# Altium PCB BYTE_SPIne.PcbDoc (part 1 of 3)
Units mm, origin at the board's own origin, x right, y up, seen from the top; angles counter-clockwise.
Board outline 108 x 73 mm, 4 copper layers (Top Layer, GND, PWR, Bottom Layer), stack 1.586 mm thick; 173 components, 126 nets, 724 pads, 308 vias.
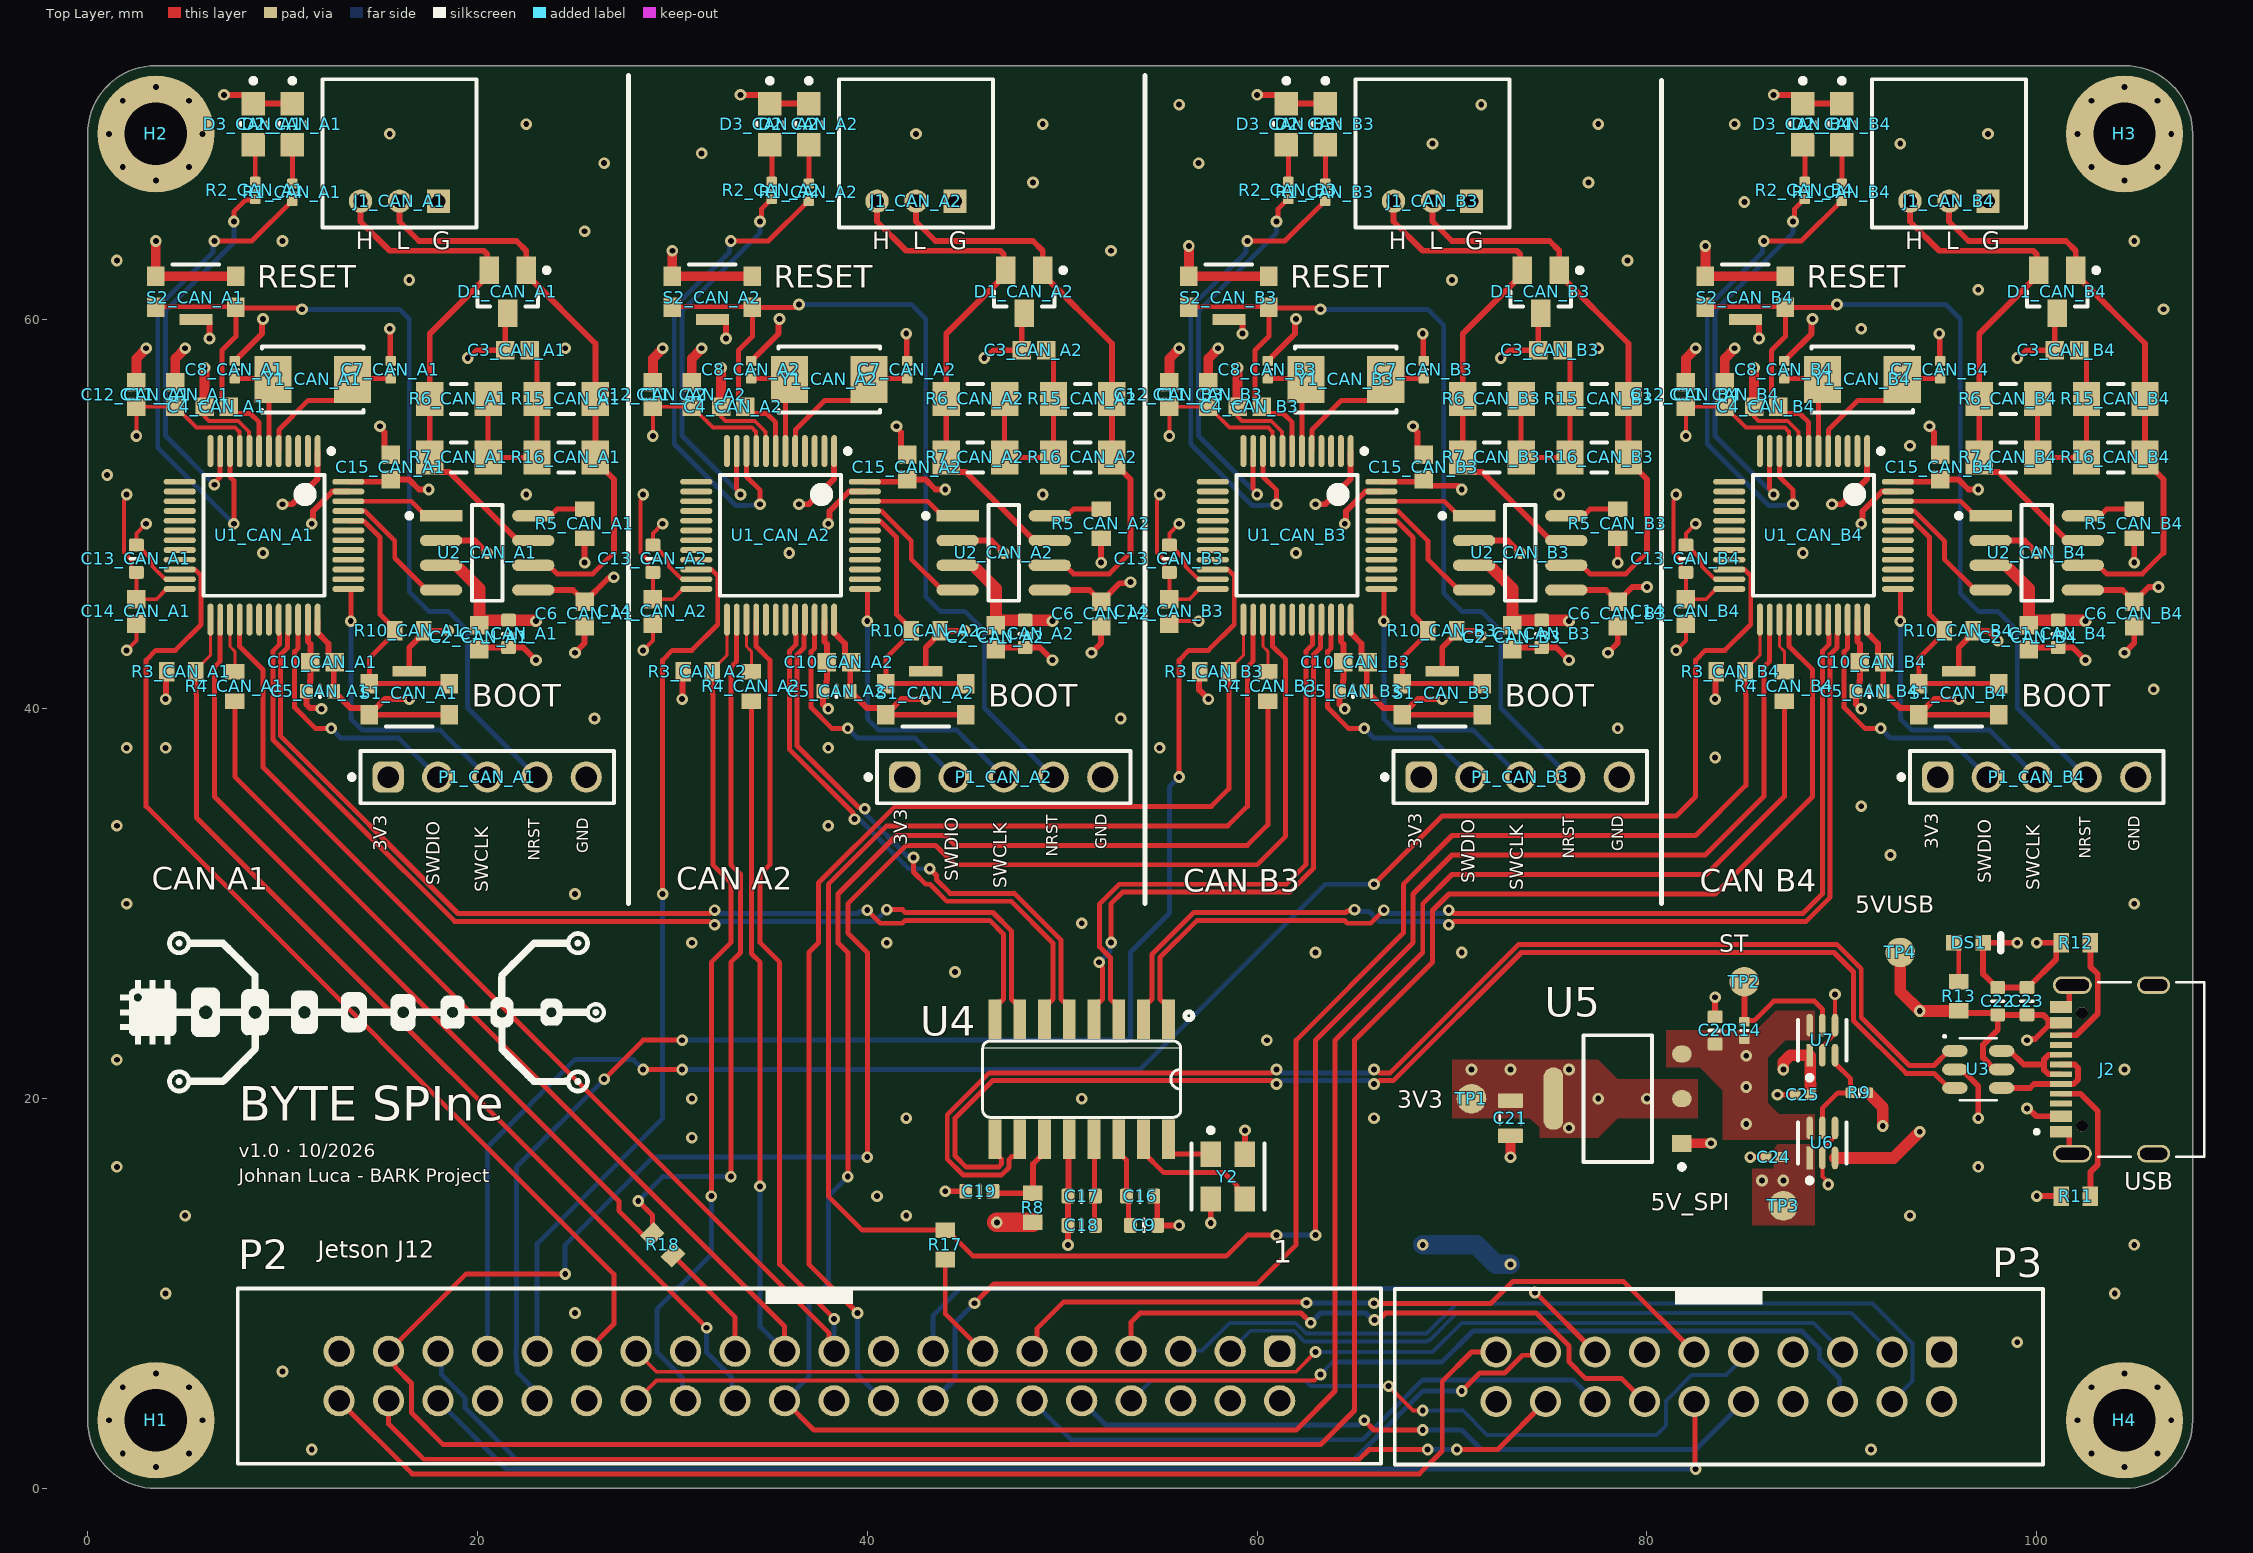
[diagram p0: Top Layer view]
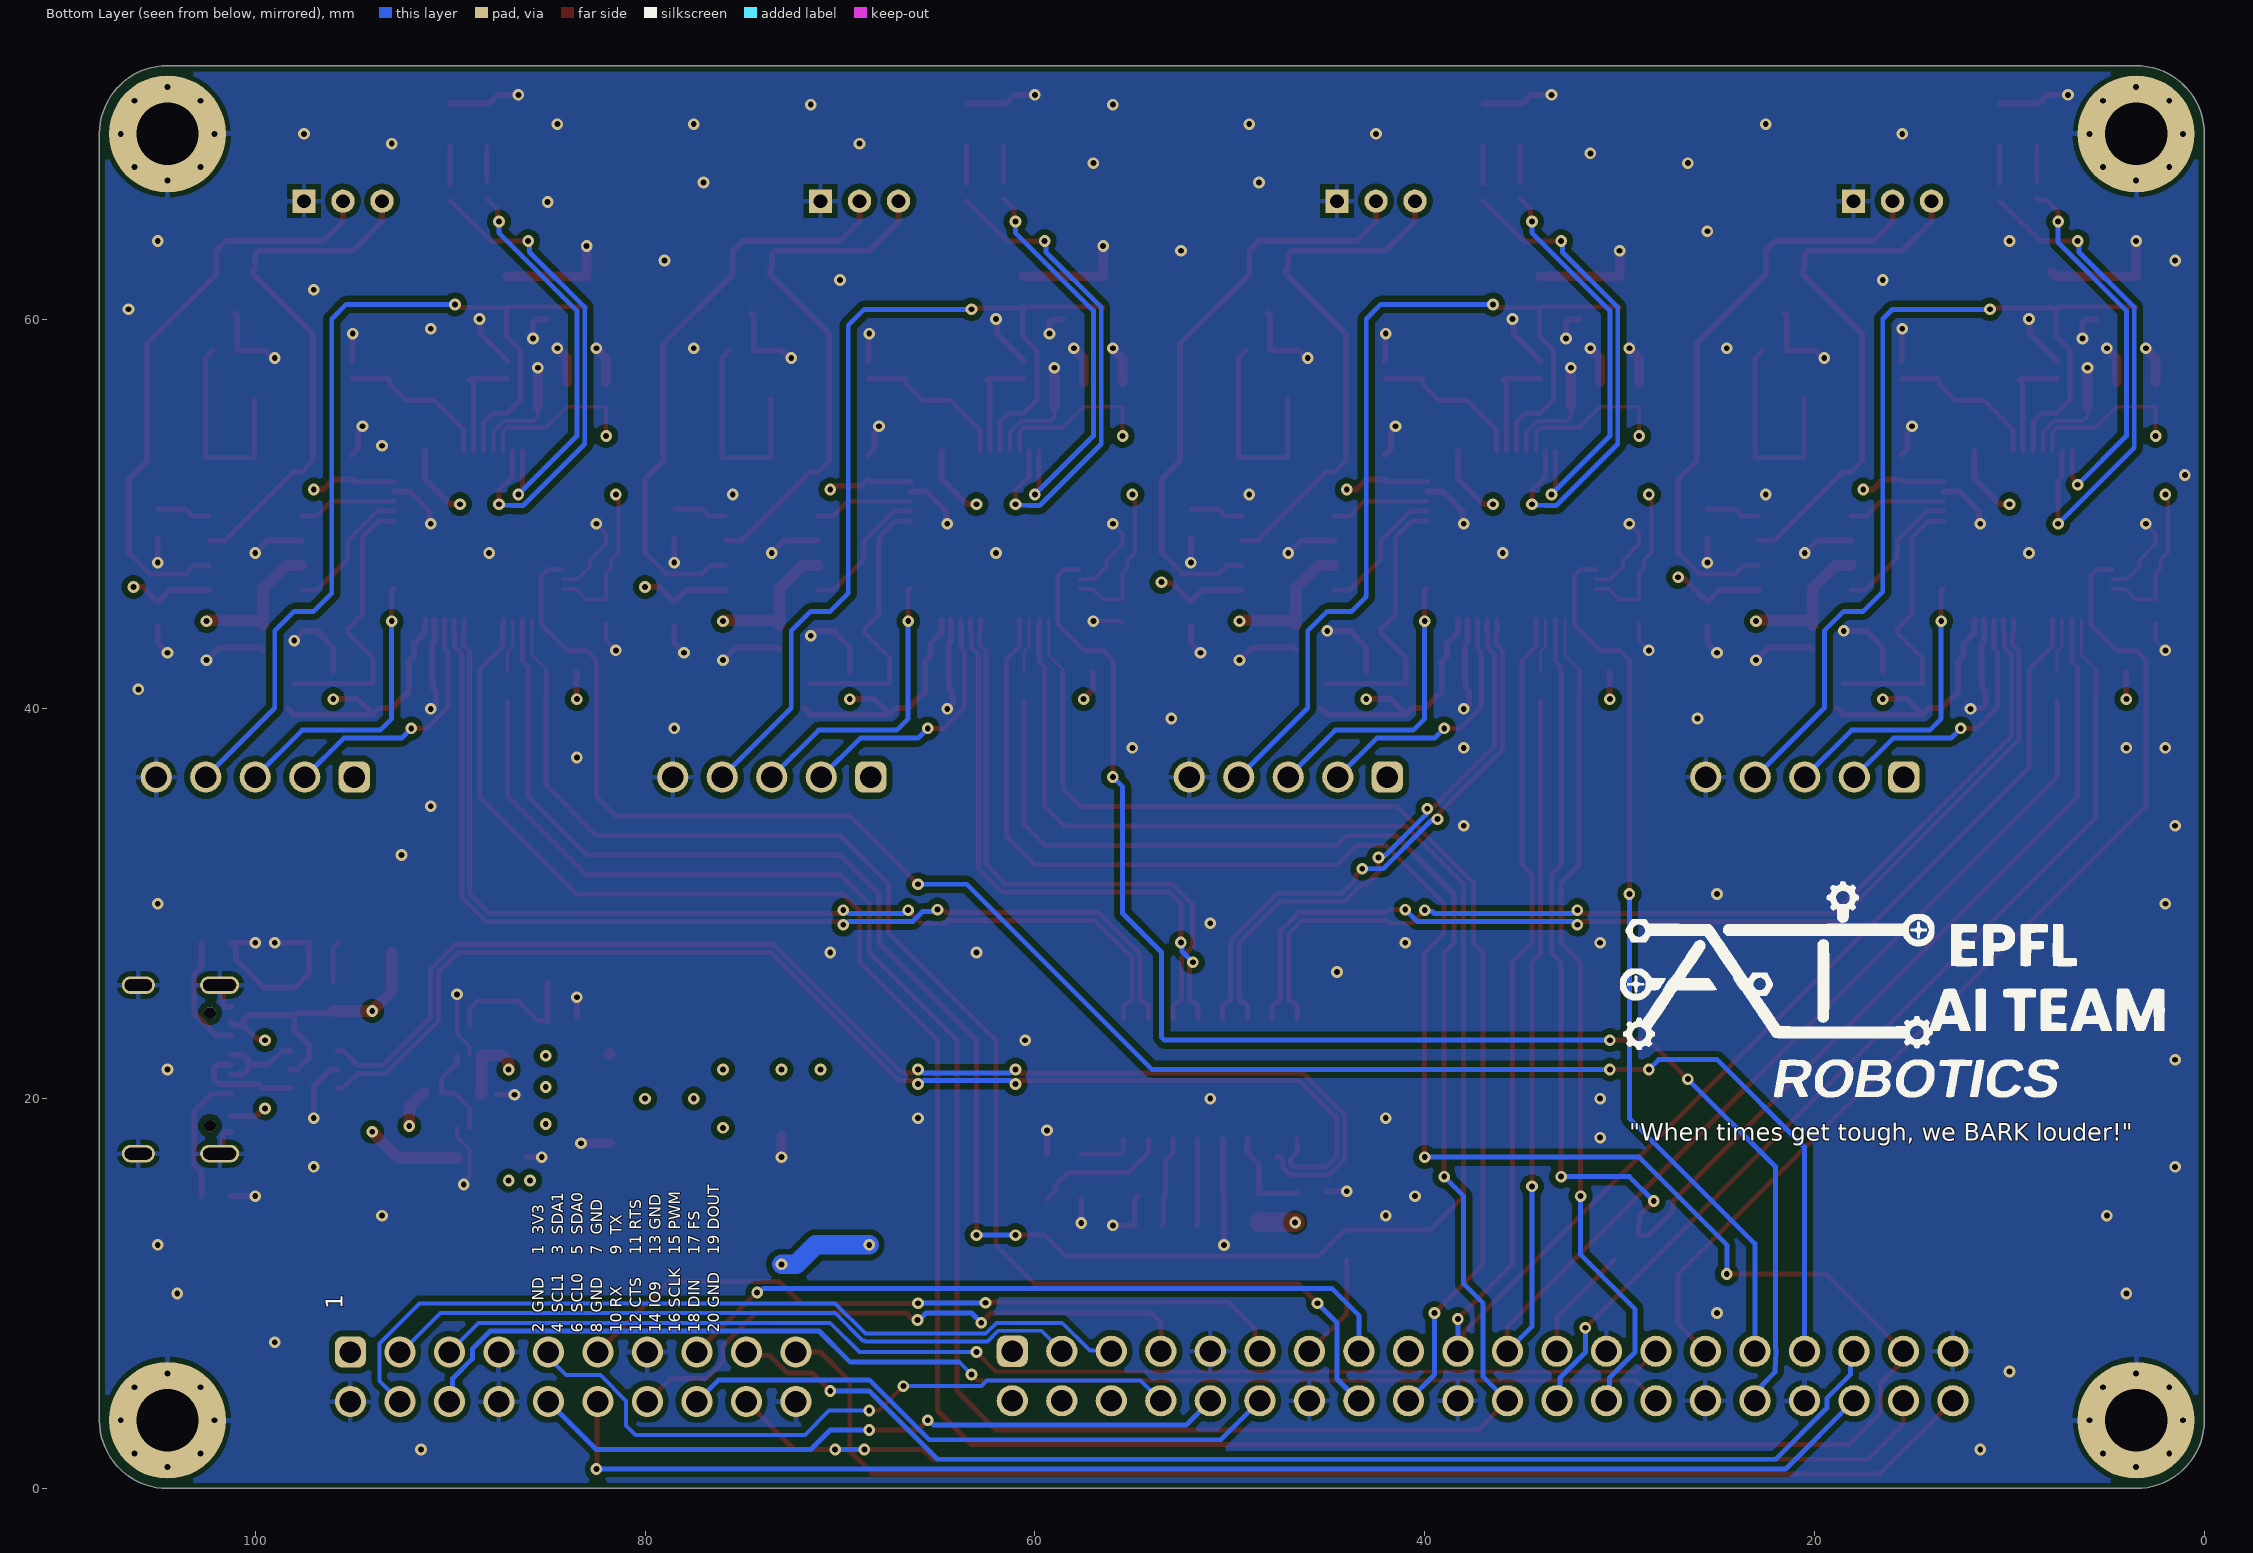
[diagram p1: Bottom Layer view, seen from below]
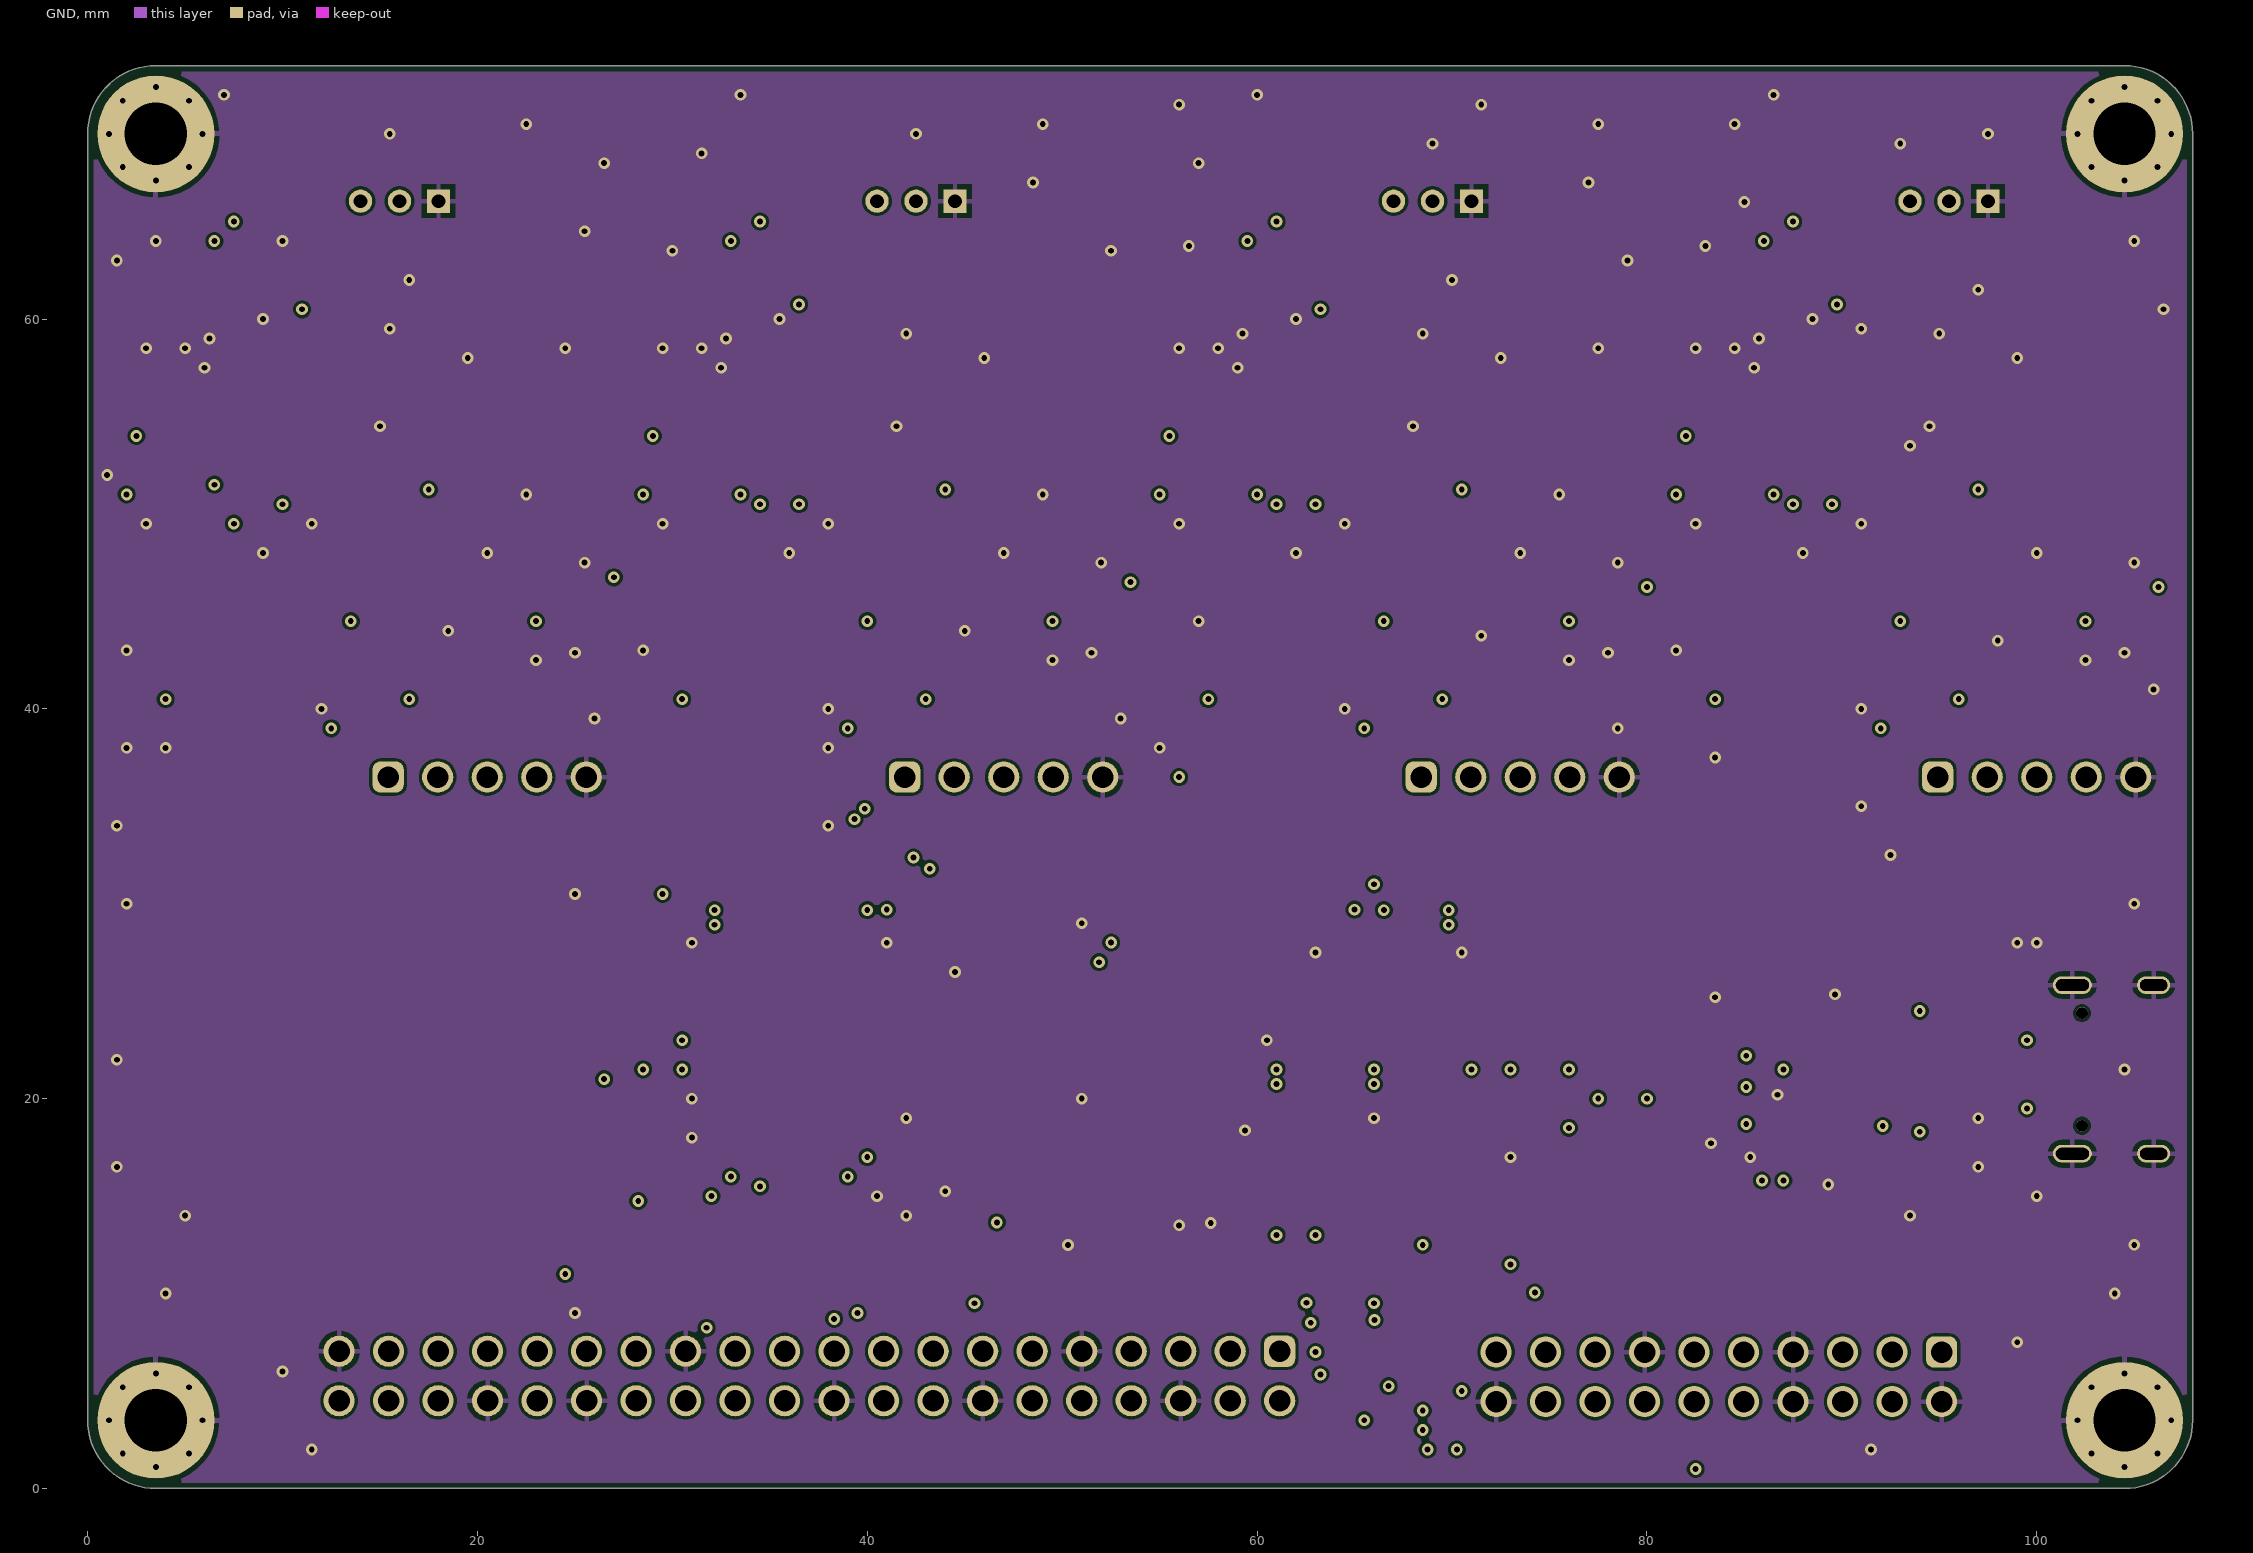
[diagram p2: GND]
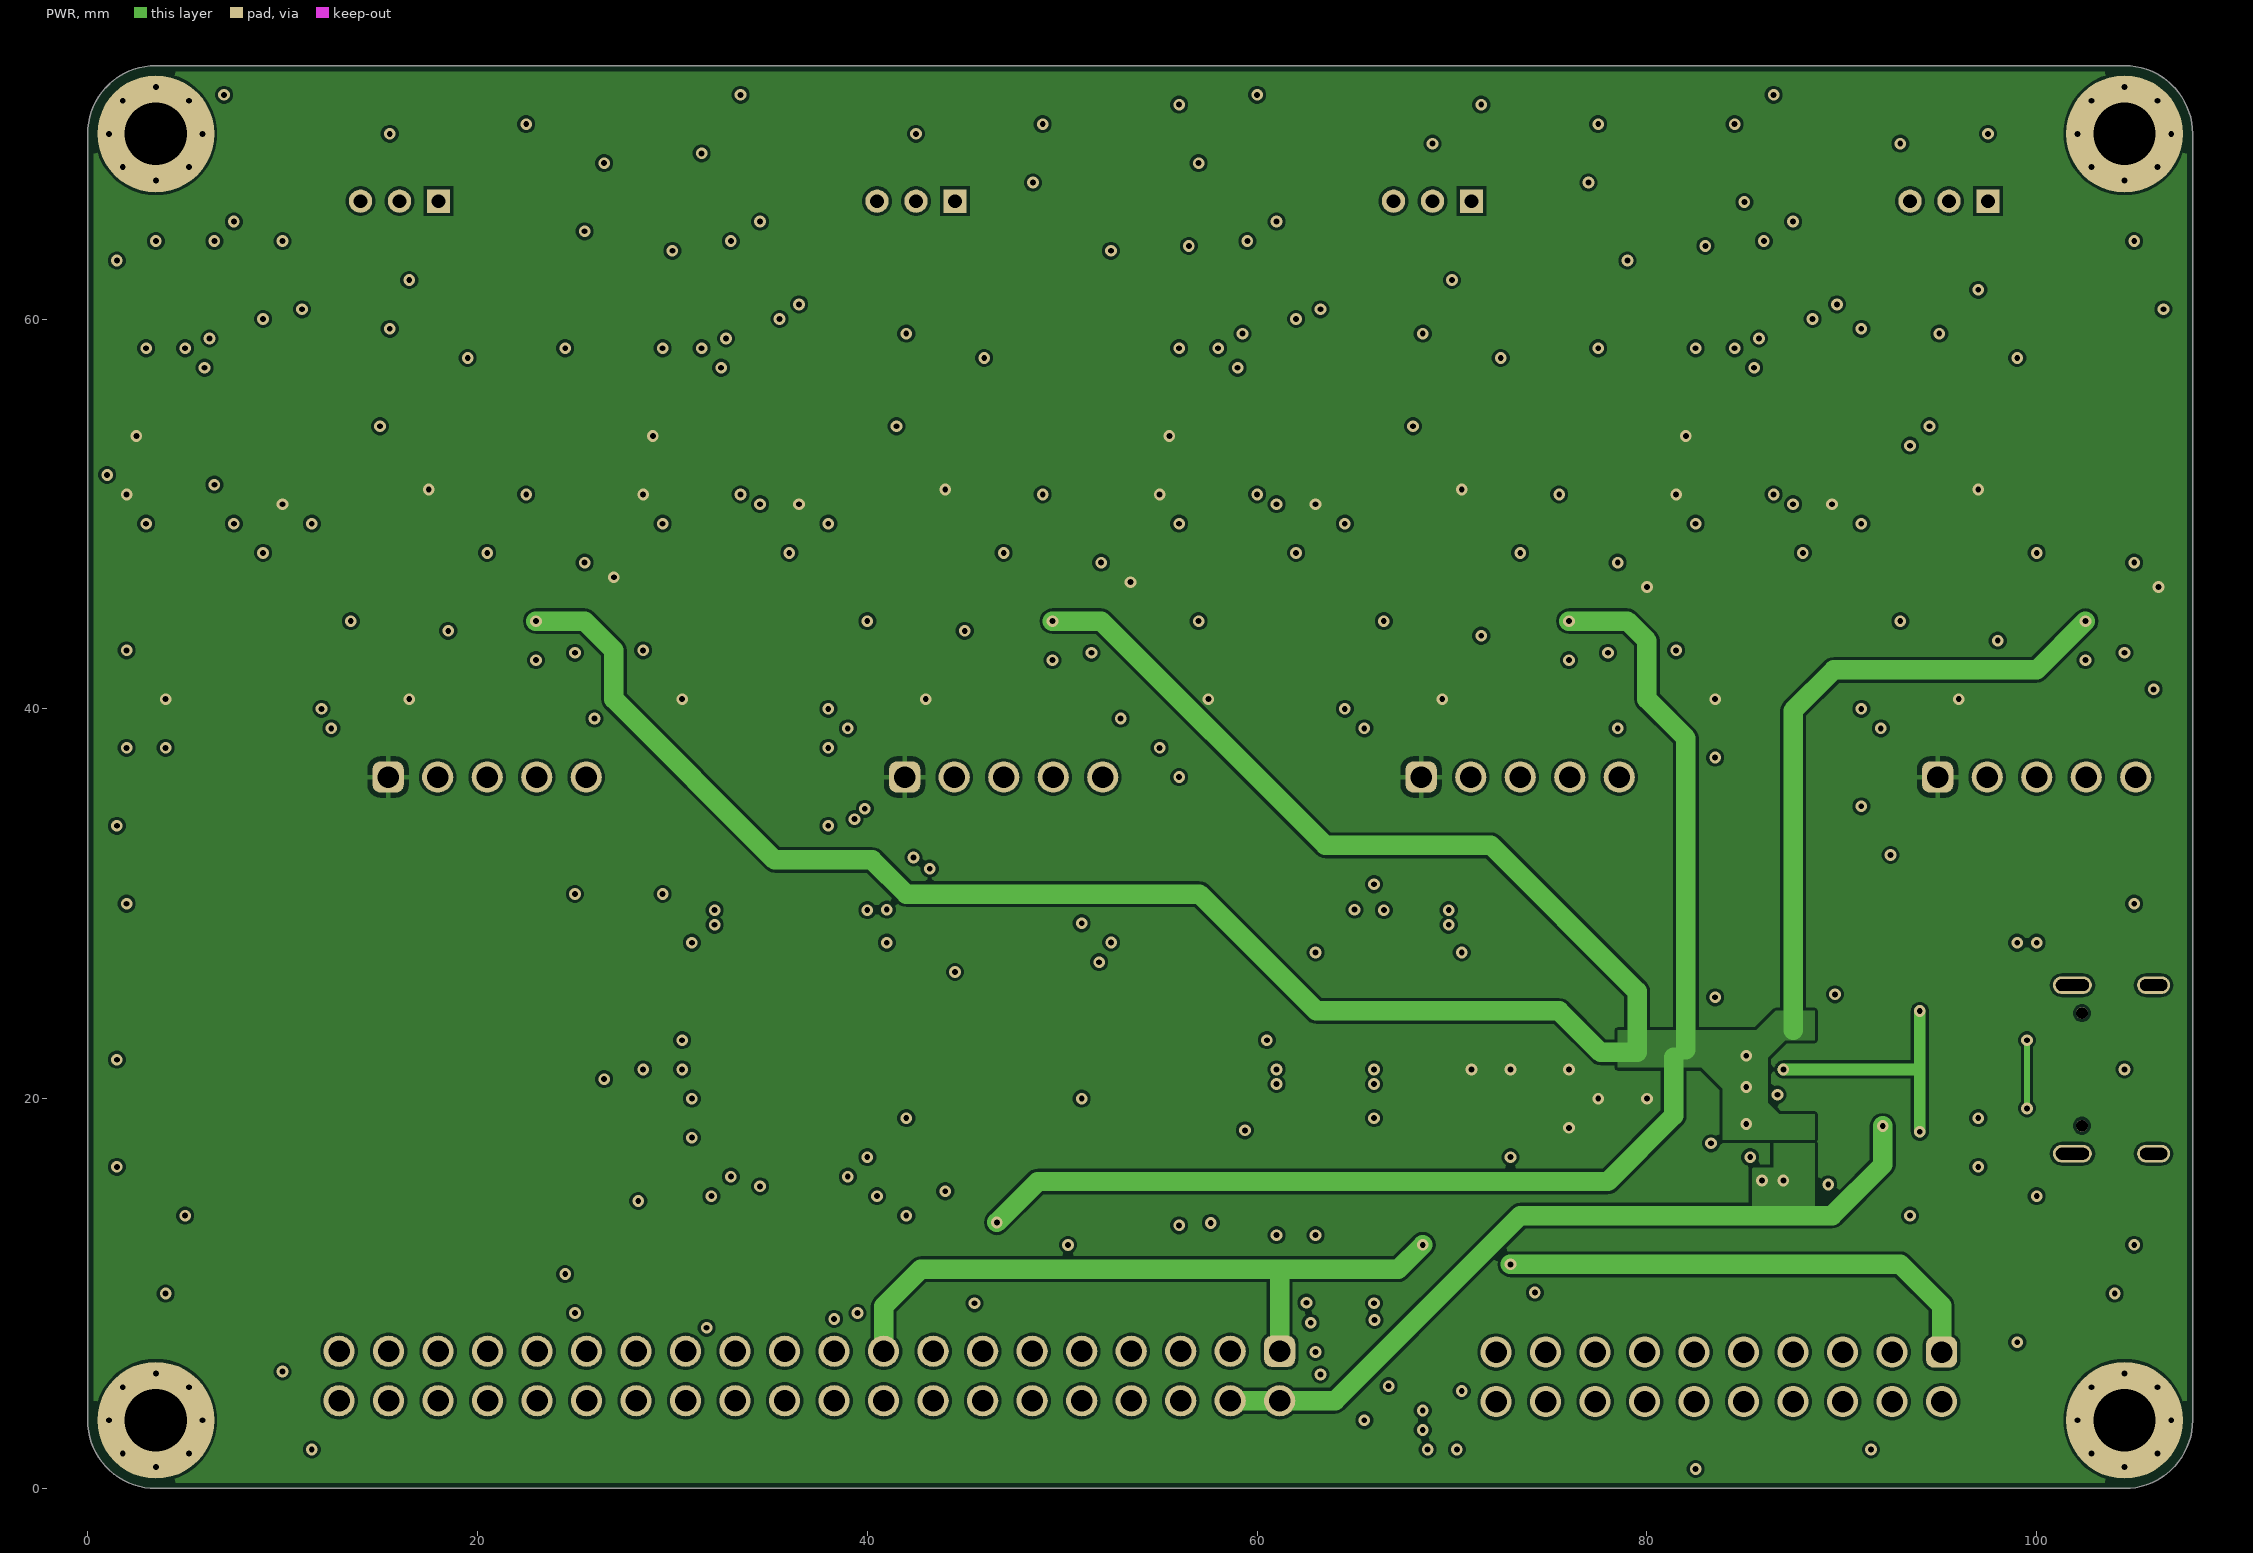
[diagram p3: PWR]
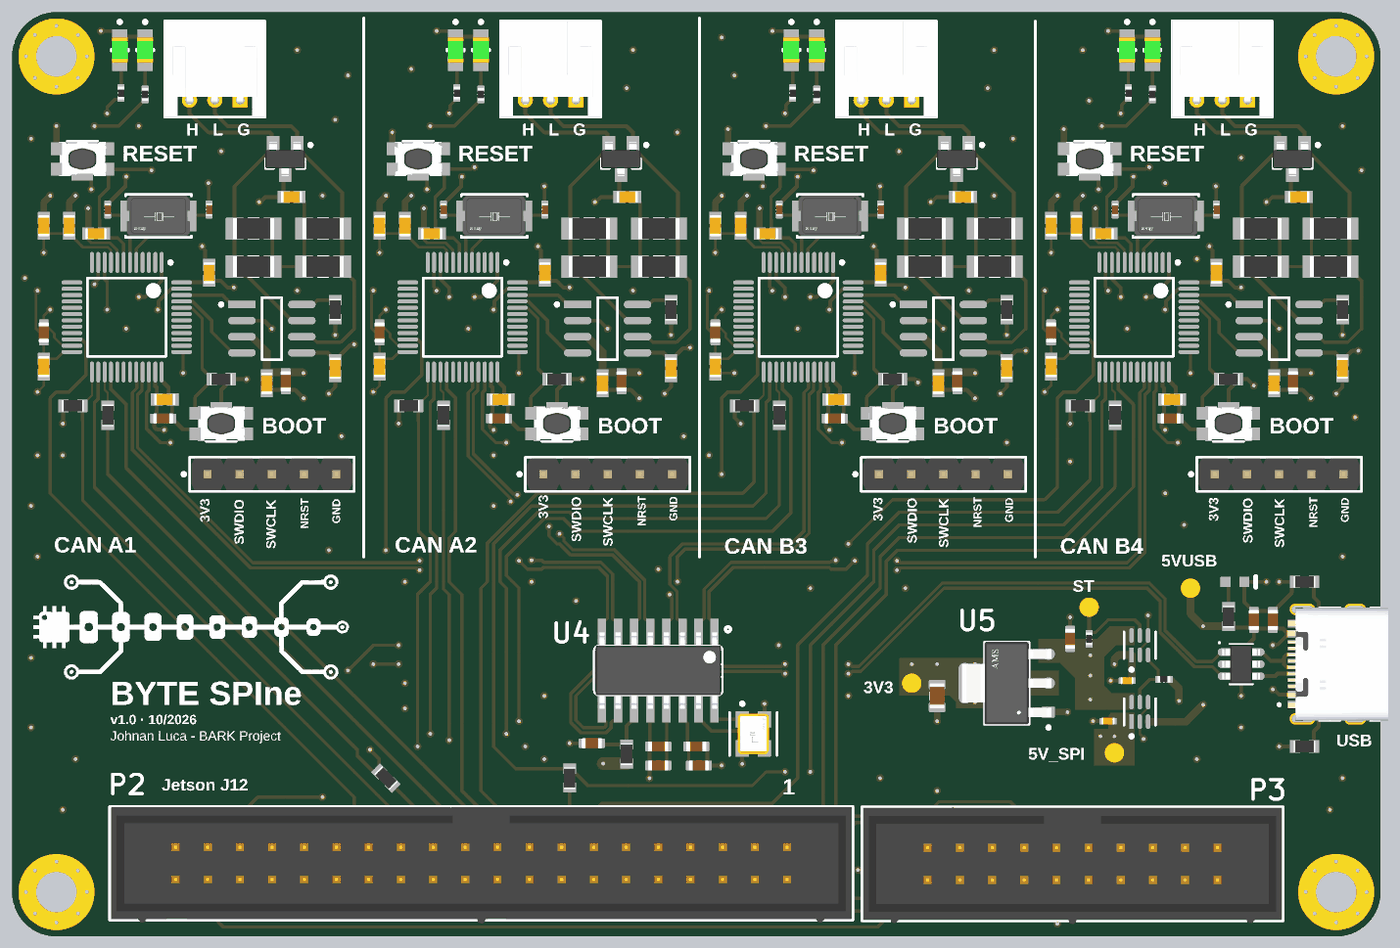
[diagram p5: 3D render of the assembled board from above, using the file's embedded part models]

## Layer stack, top to bottom
Top Solder: solder mask 0.0152, Solder Resist, Dk 3.8
Top Layer: signal copper 0.035
Dielectric 1: prepreg 0.2104, NP-155F, Dk 4.4
GND: signal copper 0.0152
Dielectric 2: core 1.065, NP-155F, Dk 4.43
PWR: signal copper 0.0152
Dielectric 3: prepreg 0.2104, NP-155F, Dk 4.4
Bottom Layer: signal copper 0.035
Bottom Solder: solder mask 0.0152, Solder Resist, Dk 3.8

## Board outline
3.5,0 cw(c3.5,3.5) 0,3.5 0,69.5 cw(c3.5,69.5) 3.5,73 104.5,73 cw(c104.5,69.5) 108,69.5 108,3.5 cw(c104.5,3.5) 104.5,0

## Design rules (kind name [scope] priority, off if disabled: settings)
BoardOutlineClearance [All] p1: gap=0.3 ignorepadtopadclearanceinfootprint=FALSE
Clearance Clearance_Polygons [InPolygon and OnLayer('Bottom Layer')] p1: gap=0.3 ignorepadtopadclearanceinfootprint=FALSE
Clearance [All] p2: gap=0.15 ignorepadtopadclearanceinfootprint=FALSE
DiffPairsRouting [All] p1: maxlimit=0.254 minlimit=0.15 mostfreqgap=0.15 toplayer_minwidth=0.15 toplayer_maxwidth=0.3 toplayer_prefwidth=0.25 midlayer1_minwidth=0.15 midlayer1_maxwidth=0.3 midlayer1_prefwidth=0.25 midlayer2_minwidth=0.15 midlayer2_maxwidth=0.3 midlayer2_prefwidth=0.25 bottomlayer_minwidth=0.15 bottomlayer_maxwidth=0.3 bottomlayer_prefwidth=0.25 maxuncoupledlength=5
HoleSize [All] p1: absolutevalues=TRUE maxlimit=3.5 minlimit=0.025 maxpercent=80.000 minpercent=20.000
MinimumAnnularRing [All] p1: minimumring=0.1
MinimumSolderMaskSliver [All] p1: minsoldermaskwidth=0.1
PolygonConnect PolygonConnect_Direct [All] p1: thpad.connectstyle=Relief thpad.reliefconductorwidth=0.254 thpad.reliefentries=4 thpad.polygonreliefangle="90 Angle" thpad.airgapwidth=0.254 smdpad.connectstyle=Direct smdpad.reliefconductorwidth=0.254 smdpad.reliefentries=4 smdpad.polygonreliefangle="90 Angle" smdpad.airgapwidth=0.254 via.connectstyle=Direct via.reliefconductorwidth=0.254 via.reliefentries=4 via.polygonreliefangle="90 Angle" via.airgapwidth=0.254
PolygonConnect [All] p2: connectstyle=Relief reliefconductorwidth=0.254 reliefentries=4 polygonreliefangle="90 Angle" airgapwidth=0.254
RoomDefinition CAN_A2 [InComponentClass('CAN_A2')] p1: confinementstyle=ConfineIn formatcopy=TRUE lockcomponents=FALSE outline 28,30 54.05,30 54.05,73 28,73
RoomDefinition CAN_A1 [InComponentClass('CAN_A1')] p2: confinementstyle=ConfineIn formatcopy=TRUE lockcomponents=FALSE outline 1.5,30 27.55,30 27.55,73 1.5,73
RoomDefinition CAN_B4 [InComponentClass('CAN_B4')] p3: confinementstyle=ConfineIn formatcopy=TRUE lockcomponents=FALSE outline 81,30 107.05,30 107.05,73 81,73
RoomDefinition CAN_B3 [InComponentClass('CAN_B3')] p4: confinementstyle=ConfineIn formatcopy=TRUE lockcomponents=FALSE outline 54.5,30 80.55,30 80.55,73 54.5,73
RoutingVias [All] p1: holewidth=0.3 width=0.6 viastyle="Through Hole" minholewidth=0.3 minwidth=0.6 maxholewidth=0.4 maxwidth=0.8
SignalStimulus [All] p1: kind=1 level=0 starttime=10.00n stoptime=60.00n periodtime=100.0n
SignalTopValue [All] p1: minimum=3.300
SilkToSilkClearance [All] p1: silktosilkclearance=0.1
SilkToSolderMaskClearance [IsPad] p1: minsilkscreentomaskgap=0.1 clearancetoexposedcopper=TRUE
SolderMaskExpansion SolderMaskExpansion_1 [IsVia] p1: expansion=0 istentingtop=TRUE
SolderMaskExpansion [All] p2: expansion=0 istentingtop=FALSE
SupplyNets SupplyNets_5VUSB [InNet('5VUSB')] p1: voltage=5.000
SupplyNets SupplyNets_5V_SPI [InNet('5V_SPI')] p2: voltage=5.000
SupplyNets SupplyNets_5V [InNet('5V')] p3: voltage=5.000
SupplyNets SupplyNets_3V3_Jetson [InNet('3V3_Jetson')] p4: voltage=3.300
SupplyNets SupplyNets_3V3 [InNet('3V3')] p5: voltage=3.300
SupplyNets SupplyNets_GND [InNet('GND')] p6: voltage=0.000
SupplyNets "Schematic Supply Nets" [InNet('GND')] p7: voltage=0.000
Width Width_pwr_3v3 [InNet('3V3') or InNet('GND')] p1: maxlimit=1 minlimit=0.2 preferedwidth=0.3
Width Width_pwr [InNet('5V_SPI') or InNet('5VUSB') or InNet('5V')] p2: maxlimit=1 minlimit=0.3 preferedwidth=0.6
Width [All] p3: maxlimit=1 minlimit=0.15 preferedwidth=0.254
25 further rules are at their usual default settings.

## Classes and differential pairs
channel class CAN_channel: CAN_A1 CAN_A2 CAN_B3 CAN_B4
net class USB_DP[1..4]: USB_DP1 USB_DP2 USB_DP3 USB_DP4
net class USB_DM[1..4]: USB_DM1 USB_DM2 USB_DM3 USB_DM4
net class SPI_NSS[1..4]: SPI_NSS1 SPI_NSS2 SPI_NSS3 SPI_NSS4
net class SPI_INT[1..4]: SPI_INT1 SPI_INT2 SPI_INT3 SPI_INT4
component class U_USB_Communication: C22 C23 DS1 J2 R11 R12 R13 U3
component class CAN_B4: C1_CAN_B4 C2_CAN_B4 C3_CAN_B4 C4_CAN_B4 C5_CAN_B4 C6_CAN_B4 C7_CAN_B4 C8_CAN_B4 C10_CAN_B4 C11_CAN_B4 C12_CAN_B4 C13_CAN_B4 C14_CAN_B4 C15_CAN_B4 D1_CAN_B4 D2_CAN_B4 D3_CAN_B4 J1_CAN_B4 P1_CAN_B4 R1_CAN_B4 R2_CAN_B4 R3_CAN_B4 R4_CAN_B4 R5_CAN_B4 R6_CAN_B4 R7_CAN_B4 R10_CAN_B4 R15_CAN_B4 R16_CAN_B4 S1_CAN_B4 S2_CAN_B4 U1_CAN_B4 U2_CAN_B4 Y1_CAN_B4
component class CAN_B3: C1_CAN_B3 C2_CAN_B3 C3_CAN_B3 C4_CAN_B3 C5_CAN_B3 C6_CAN_B3 C7_CAN_B3 C8_CAN_B3 C10_CAN_B3 C11_CAN_B3 C12_CAN_B3 C13_CAN_B3 C14_CAN_B3 C15_CAN_B3 D1_CAN_B3 D2_CAN_B3 D3_CAN_B3 J1_CAN_B3 P1_CAN_B3 R1_CAN_B3 R2_CAN_B3 R3_CAN_B3 R4_CAN_B3 R5_CAN_B3 R6_CAN_B3 R7_CAN_B3 R10_CAN_B3 R15_CAN_B3 R16_CAN_B3 S1_CAN_B3 S2_CAN_B3 U1_CAN_B3 U2_CAN_B3 Y1_CAN_B3
component class CAN_A2: C1_CAN_A2 C2_CAN_A2 C3_CAN_A2 C4_CAN_A2 C5_CAN_A2 C6_CAN_A2 C7_CAN_A2 C8_CAN_A2 C10_CAN_A2 C11_CAN_A2 C12_CAN_A2 C13_CAN_A2 C14_CAN_A2 C15_CAN_A2 D1_CAN_A2 D2_CAN_A2 D3_CAN_A2 J1_CAN_A2 P1_CAN_A2 R1_CAN_A2 R2_CAN_A2 R3_CAN_A2 R4_CAN_A2 R5_CAN_A2 R6_CAN_A2 R7_CAN_A2 R10_CAN_A2 R15_CAN_A2 R16_CAN_A2 S1_CAN_A2 S2_CAN_A2 U1_CAN_A2 U2_CAN_A2 Y1_CAN_A2
component class CAN_A1: C1_CAN_A1 C2_CAN_A1 C3_CAN_A1 C4_CAN_A1 C5_CAN_A1 C6_CAN_A1 C7_CAN_A1 C8_CAN_A1 C10_CAN_A1 C11_CAN_A1 C12_CAN_A1 C13_CAN_A1 C14_CAN_A1 C15_CAN_A1 D1_CAN_A1 D2_CAN_A1 D3_CAN_A1 J1_CAN_A1 P1_CAN_A1 R1_CAN_A1 R2_CAN_A1 R3_CAN_A1 R4_CAN_A1 R5_CAN_A1 R6_CAN_A1 R7_CAN_A1 R10_CAN_A1 R15_CAN_A1 R16_CAN_A1 S1_CAN_A1 S2_CAN_A1 U1_CAN_A1 U2_CAN_A1 Y1_CAN_A1
component class BYTE_SPIne: C9 C16 C17 C18 C19 C20 C21 C24 C25 H1 H2 H3 H4 P2 P3 R8 R9 R14 R17 R18 TP1 TP2 TP3 TP4 U4 U5 U6 U7 Y2

## Components (designator, comment, footprint, x,y, rotation, side; value= is the part's Value field where it differs from the comment)
C1_CAN_A1 "4.7uF" CAPC0603(1608)100_L 21.6,43.85 r270 top value=4.7µF (schematic designator C1)
C1_CAN_A2 "4.7uF" CAPC0603(1608)100_L 48.1,43.85 r270 top value=4.7µF (schematic designator C1)
C1_CAN_B3 "4.7uF" CAPC0603(1608)100_L 74.6,43.85 r270 top value=4.7µF (schematic designator C1)
C1_CAN_B4 "4.7uF" CAPC0603(1608)100_L 101.1,43.85 r270 top value=4.7µF (schematic designator C1)
C2_CAN_A1 "100nF" CAPC1608X90X40NL10T20 20.1,43.675 r270 top (schematic designator C2)
C2_CAN_A2 "100nF" CAPC1608X90X40NL10T20 46.6,43.675 r270 top (schematic designator C2)
C2_CAN_B3 "100nF" CAPC1608X90X40NL10T20 73.1,43.675 r270 top (schematic designator C2)
C2_CAN_B4 "100nF" CAPC1608X90X40NL10T20 99.6,43.675 r270 top (schematic designator C2)
C3_CAN_A1 "4.7nF" CAPC1608X90X40NL10T20 22.05,58.4 r180 top (schematic designator C3)
C3_CAN_A2 "4.7nF" CAPC1608X90X40NL10T20 48.55,58.4 r180 top (schematic designator C3)
C3_CAN_B3 "4.7nF" CAPC1608X90X40NL10T20 75.05,58.4 r180 top (schematic designator C3)
C3_CAN_B4 "4.7nF" CAPC1608X90X40NL10T20 101.55,58.4 r180 top (schematic designator C3)
C4_CAN_A1 "100nF" CAPC1608X90X40NL10T20 6.625,55.5 r180 top (schematic designator C4)
C4_CAN_A2 "100nF" CAPC1608X90X40NL10T20 33.125,55.5 r180 top (schematic designator C4)
C4_CAN_B3 "100nF" CAPC1608X90X40NL10T20 59.625,55.5 r180 top (schematic designator C4)
C4_CAN_B4 "100nF" CAPC1608X90X40NL10T20 86.125,55.5 r180 top (schematic designator C4)
C5_CAN_A1 "4.7uF" CAPC0603(1608)100_L 11.925,40.9 r180 top value=4.7µF (schematic designator C5)
C5_CAN_A2 "4.7uF" CAPC0603(1608)100_L 38.425,40.9 r180 top value=4.7µF (schematic designator C5)
C5_CAN_B3 "4.7uF" CAPC0603(1608)100_L 64.925,40.9 r180 top value=4.7µF (schematic designator C5)
C5_CAN_B4 "4.7uF" CAPC0603(1608)100_L 91.425,40.9 r180 top value=4.7µF (schematic designator C5)
C6_CAN_A1 "100nF" CAPC1608X90X40NL10T20 25.5,44.875 r270 top (schematic designator C6)
C6_CAN_A2 "100nF" CAPC1608X90X40NL10T20 52,44.875 r270 top (schematic designator C6)
C6_CAN_B3 "100nF" CAPC1608X90X40NL10T20 78.5,44.875 r270 top (schematic designator C6)
C6_CAN_B4 "100nF" CAPC1608X90X40NL10T20 105,44.875 r270 top (schematic designator C6)
C7_CAN_A1 "33pF" CAPC0402(1005)60_L 15.55,57.4 r270 top (schematic designator C7)
C7_CAN_A2 "33pF" CAPC0402(1005)60_L 42.05,57.4 r270 top (schematic designator C7)
C7_CAN_B3 "33pF" CAPC0402(1005)60_L 68.55,57.4 r270 top (schematic designator C7)
C7_CAN_B4 "33pF" CAPC0402(1005)60_L 95.05,57.4 r270 top (schematic designator C7)
C8_CAN_A1 "33pF" CAPC0402(1005)60_L 7.55,57.4 r270 top (schematic designator C8)
C8_CAN_A2 "33pF" CAPC0402(1005)60_L 34.05,57.4 r270 top (schematic designator C8)
C8_CAN_B3 "33pF" CAPC0402(1005)60_L 60.55,57.4 r270 top (schematic designator C8)
C8_CAN_B4 "33pF" CAPC0402(1005)60_L 87.05,57.4 r270 top (schematic designator C8)
C9 "4.7uF" CAPC0603(1608)100_L 54.2,13.5 r0 top value=4.7µF
C10_CAN_A1 "100nF" CAPC1608X90X40NL10T20 12.05,42.4 r180 top (schematic designator C10)
C10_CAN_A2 "100nF" CAPC1608X90X40NL10T20 38.55,42.4 r180 top (schematic designator C10)
C10_CAN_B3 "100nF" CAPC1608X90X40NL10T20 65.05,42.4 r180 top (schematic designator C10)
C10_CAN_B4 "100nF" CAPC1608X90X40NL10T20 91.55,42.4 r180 top (schematic designator C10)
C11_CAN_A1 "10nF" CAPC1608X90X40NL10T20 4.5,56.125 r90 top (schematic designator C11)
C11_CAN_A2 "10nF" CAPC1608X90X40NL10T20 31,56.125 r90 top (schematic designator C11)
C11_CAN_B3 "10nF" CAPC1608X90X40NL10T20 57.5,56.125 r90 top (schematic designator C11)
C11_CAN_B4 "10nF" CAPC1608X90X40NL10T20 84,56.125 r90 top (schematic designator C11)
C12_CAN_A1 "1uF" CAPC1608X90X40NL10T20 2.5,56.125 r90 top (schematic designator C12)
C12_CAN_A2 "1uF" CAPC1608X90X40NL10T20 29,56.125 r90 top (schematic designator C12)
C12_CAN_B3 "1uF" CAPC1608X90X40NL10T20 55.5,56.125 r90 top (schematic designator C12)
C12_CAN_B4 "1uF" CAPC1608X90X40NL10T20 82,56.125 r90 top (schematic designator C12)
C13_CAN_A1 "4.7uF" CAPC0603(1608)100_L 2.5,47.7 r90 top value=4.7µF (schematic designator C13)
C13_CAN_A2 "4.7uF" CAPC0603(1608)100_L 29,47.7 r90 top value=4.7µF (schematic designator C13)
C13_CAN_B3 "4.7uF" CAPC0603(1608)100_L 55.5,47.7 r90 top value=4.7µF (schematic designator C13)
C13_CAN_B4 "4.7uF" CAPC0603(1608)100_L 82,47.7 r90 top value=4.7µF (schematic designator C13)
C14_CAN_A1 "100nF" CAPC1608X90X40NL10T20 2.5,45 r270 top (schematic designator C14)
C14_CAN_A2 "100nF" CAPC1608X90X40NL10T20 29,45 r270 top (schematic designator C14)
C14_CAN_B3 "100nF" CAPC1608X90X40NL10T20 55.5,45 r270 top (schematic designator C14)
C14_CAN_B4 "100nF" CAPC1608X90X40NL10T20 82,45 r270 top (schematic designator C14)
C15_CAN_A1 "100nF" CAPC1608X90X40NL10T20 15.55,52.4 r90 top (schematic designator C15)
C15_CAN_A2 "100nF" CAPC1608X90X40NL10T20 42.05,52.4 r90 top (schematic designator C15)
C15_CAN_B3 "100nF" CAPC1608X90X40NL10T20 68.55,52.4 r90 top (schematic designator C15)
C15_CAN_B4 "100nF" CAPC1608X90X40NL10T20 95.05,52.4 r90 top (schematic designator C15)
C16 "100nF" CAPC0603(1608)100_L 54,15 r0 top value=0.1uF
C17 "100nF" CAPC0603(1608)100_L 51,15 r180 top value=0.1uF
C18 "4.7uF" CAPC0603(1608)100_L 51,13.5 r180 top value=4.7µF
C19 "4.7uF" CAPC0603(1608)100_L 45.75,15.25 r180 top value=4.7µF
C20 "10uF" CAPC0603(1608)100_L 83.5,23.5 r270 top value=10µF
C21 "22uF" CAPC0805(2012)145_L 73,19 r90 top value=22µF
C22 "10uF" CAPC0603(1608)100_L 98,25 r90 top value=10µF
C23 "100nF" CAPC0603(1608)100_L 99.5,25 r90 top value=0.1µF
C24 "1uF" CAPC1005X55X25LL05T10 86.5,17 r0 top value=1µF
C25 "1uF" CAPC1005X55X25LL05T10 88,20.2 r0 top value=1µF
D1_CAN_A1 "PESD1CAN" FAIR-SOT23-3_V 21.55,61.4 r270 top (schematic designator D1)
D1_CAN_A2 "PESD1CAN" FAIR-SOT23-3_V 48.05,61.4 r270 top (schematic designator D1)
D1_CAN_B3 "PESD1CAN" FAIR-SOT23-3_V 74.55,61.4 r270 top (schematic designator D1)
D1_CAN_B4 "PESD1CAN" FAIR-SOT23-3_V 101.05,61.4 r270 top (schematic designator D1)
D2_CAN_A1 "KT-0805G (Kento)" FP-LTST-C170GKT-MFG 10.5,70 r270 top (schematic designator D2)
D2_CAN_A2 "KT-0805G (Kento)" FP-LTST-C170GKT-MFG 37,70 r270 top (schematic designator D2)
D2_CAN_B3 "KT-0805G (Kento)" FP-LTST-C170GKT-MFG 63.5,70 r270 top (schematic designator D2)
D2_CAN_B4 "KT-0805G (Kento)" FP-LTST-C170GKT-MFG 90,70 r270 top (schematic designator D2)
D3_CAN_A1 "KT-0805Y (Kento)" FP-LTST-C170GKT-MFG 8.5,70 r270 top (schematic designator D3)
D3_CAN_A2 "KT-0805Y (Kento)" FP-LTST-C170GKT-MFG 35,70 r270 top (schematic designator D3)
D3_CAN_B3 "KT-0805Y (Kento)" FP-LTST-C170GKT-MFG 61.5,70 r270 top (schematic designator D3)
D3_CAN_B4 "KT-0805Y (Kento)" FP-LTST-C170GKT-MFG 88,70 r270 top (schematic designator D3)
DS1 "KT-0603R (Kento)" AVAG-HSMX-C190_V 96.5,28 r0 top
H1 "M3" MH_M3_PTH 3.5,3.5 r0 top locked
H2 "M3" MH_M3_PTH 3.5,69.5 r0 top locked
H3 "M3" MH_M3_PTH 104.5,69.5 r0 top locked
H4 "M3" MH_M3_PTH 104.5,3.5 r0 top locked
J1_CAN_A1 "S3B-PH-K-S(LF)(SN)" FP-S3B-PH-K-S_LF_SN-MFG 16,68.5 r0 top (schematic designator J1)
J1_CAN_A2 "S3B-PH-K-S(LF)(SN)" FP-S3B-PH-K-S_LF_SN-MFG 42.5,68.5 r0 top (schematic designator J1)
J1_CAN_B3 "S3B-PH-K-S(LF)(SN)" FP-S3B-PH-K-S_LF_SN-MFG 69,68.5 r0 top (schematic designator J1)
J1_CAN_B4 "S3B-PH-K-S(LF)(SN)" FP-S3B-PH-K-S_LF_SN-MFG 95.5,68.5 r0 top (schematic designator J1)
J2 "TYPE-C-31-M-12" HRO_TYPE-C-31-M-12 106,21.5 r90 top
P1_CAN_A1 "Generic header 2.54mm" 61300511121 20.5,36.5 r0 top (schematic designator P1)
P1_CAN_A2 "Generic header 2.54mm" 61300511121 47,36.5 r0 top (schematic designator P1)
P1_CAN_B3 "Generic header 2.54mm" 61300511121 73.5,36.5 r0 top (schematic designator P1)
P1_CAN_B4 "Generic header 2.54mm" 61300511121 100,36.5 r0 top (schematic designator P1)
P2 "61204021621" 61204021621 37.03,5.77 r180 top
P3 "61202021621" 61202021621 83.69,5.73 r180 top
R1_CAN_A1 "100" RESC0402(1005)_L 10.5,66.5 r270 top (schematic designator R1)
R1_CAN_A2 "100" RESC0402(1005)_L 37,66.5 r270 top (schematic designator R1)
R1_CAN_B3 "100" RESC0402(1005)_L 63.5,66.5 r270 top (schematic designator R1)
R1_CAN_B4 "100" RESC0402(1005)_L 90,66.5 r270 top (schematic designator R1)
R2_CAN_A1 "1k" RESC0402(1005)_L 8.6,66.6 r270 top (schematic designator R2)
R2_CAN_A2 "1k" RESC0402(1005)_L 35.1,66.6 r270 top (schematic designator R2)
R2_CAN_B3 "1k" RESC0402(1005)_L 61.6,66.6 r270 top (schematic designator R2)
R2_CAN_B4 "1k" RESC0402(1005)_L 88.1,66.6 r270 top (schematic designator R2)
R3_CAN_A1 "100k" RESC1608X55X25ML10T15 4.8,41.9 r180 top (schematic designator R3)
R3_CAN_A2 "100k" RESC1608X55X25ML10T15 31.3,41.9 r180 top (schematic designator R3)
R3_CAN_B3 "100k" RESC1608X55X25ML10T15 57.8,41.9 r180 top (schematic designator R3)
R3_CAN_B4 "100k" RESC1608X55X25ML10T15 84.3,41.9 r180 top (schematic designator R3)
R4_CAN_A1 "33" RESC1608X55X25ML10T15 7.55,41.15 r270 top (schematic designator R4)
R4_CAN_A2 "33" RESC1608X55X25ML10T15 34.05,41.15 r270 top (schematic designator R4)
R4_CAN_B3 "33" RESC1608X55X25ML10T15 60.55,41.15 r270 top (schematic designator R4)
R4_CAN_B4 "33" RESC1608X55X25ML10T15 87.05,41.15 r270 top (schematic designator R4)
R5_CAN_A1 "10k" RESC1608X55X25ML10T15 25.5,49.5 r90 top (schematic designator R5)
R5_CAN_A2 "10k" RESC1608X55X25ML10T15 52,49.5 r90 top (schematic designator R5)
R5_CAN_B3 "10k" RESC1608X55X25ML10T15 78.5,49.5 r90 top (schematic designator R5)
R5_CAN_B4 "10k" RESC1608X55X25ML10T15 105,49.5 r90 top (schematic designator R5)
R6_CAN_A1 "120" RESC3116X70X50ML13T20 19.05,55.9 r180 top (schematic designator R6)
R6_CAN_A2 "120" RESC3116X70X50ML13T20 45.55,55.9 r180 top (schematic designator R6)
R6_CAN_B3 "120" RESC3116X70X50ML13T20 72.05,55.9 r180 top (schematic designator R6)
R6_CAN_B4 "120" RESC3116X70X50ML13T20 98.55,55.9 r180 top (schematic designator R6)
R7_CAN_A1 "120" RESC3116X70X50ML13T20 19.05,52.9 r180 top (schematic designator R7)
R7_CAN_A2 "120" RESC3116X70X50ML13T20 45.55,52.9 r180 top (schematic designator R7)
R7_CAN_B3 "120" RESC3116X70X50ML13T20 72.05,52.9 r180 top (schematic designator R7)
R7_CAN_B4 "120" RESC3116X70X50ML13T20 98.55,52.9 r180 top (schematic designator R7)
R8 "4.7" RESC1608X55X25ML10T15 48.5,14.4 r270 top
R9 "Resistor 100K +/-1 % 0402 63 mW" RESC0402(1005)_L 90.9,20.3 r0 top value=100k
R10_CAN_A1 "10k" RESC1608X55X25ML10T15 16.5,44 r0 top (schematic designator R10)
R10_CAN_A2 "10k" RESC1608X55X25ML10T15 43,44 r0 top (schematic designator R10)
R10_CAN_B3 "10k" RESC1608X55X25ML10T15 69.5,44 r0 top (schematic designator R10)
R10_CAN_B4 "10k" RESC1608X55X25ML10T15 96,44 r0 top (schematic designator R10)
R11 "5.1k" RESC1608X55X25ML10T15 102,15 r0 top
R12 "5.1k" RESC1608X55X25ML10T15 102,28 r180 top
R13 "1k" RESC1608X55X25ML10T15 96,25.25 r270 top
R14 "Resistor 100K +/-1 % 0402 63 mW" RESC0402(1005)_L 85,23.5 r270 top value=100k
R15_CAN_A1 "120" RESC3116X70X50ML13T20 24.55,55.9 r180 top (schematic designator R15)
R15_CAN_A2 "120" RESC3116X70X50ML13T20 51.05,55.9 r180 top (schematic designator R15)
R15_CAN_B3 "120" RESC3116X70X50ML13T20 77.55,55.9 r180 top (schematic designator R15)
R15_CAN_B4 "120" RESC3116X70X50ML13T20 104.05,55.9 r180 top (schematic designator R15)
R16_CAN_A1 "120" RESC3116X70X50ML13T20 24.55,52.9 r180 top (schematic designator R16)
R16_CAN_A2 "120" RESC3116X70X50ML13T20 51.05,52.9 r180 top (schematic designator R16)
R16_CAN_B3 "120" RESC3116X70X50ML13T20 77.55,52.9 r180 top (schematic designator R16)
R16_CAN_B4 "120" RESC3116X70X50ML13T20 104.05,52.9 r180 top (schematic designator R16)
R17 "33" RESC1608X55X25ML10T15 44,12.5 r270 top
R18 "33" RESC1608X55X25ML10T15 29.5,12.5 r315 top
S1_CAN_A1 "KMR221GLFS" SW_KMR221GLFS 16.5,40.5 r0 top (schematic designator S1)
S1_CAN_A2 "KMR221GLFS" SW_KMR221GLFS 43,40.5 r0 top (schematic designator S1)
S1_CAN_B3 "KMR221GLFS" SW_KMR221GLFS 69.5,40.5 r0 top (schematic designator S1)
S1_CAN_B4 "KMR221GLFS" SW_KMR221GLFS 96,40.5 r0 top (schematic designator S1)
S2_CAN_A1 "KMR221GLFS" SW_KMR221GLFS 5.55,61.4 r180 top (schematic designator S2)
S2_CAN_A2 "KMR221GLFS" SW_KMR221GLFS 32.05,61.4 r180 top (schematic designator S2)
S2_CAN_B3 "KMR221GLFS" SW_KMR221GLFS 58.55,61.4 r180 top (schematic designator S2)
S2_CAN_B4 "KMR221GLFS" SW_KMR221GLFS 85.05,61.4 r180 top (schematic designator S2)
TP1 "TP" TP_SMD_D1.5 71,20 r0 top
TP2 "TP" TP_SMD_D1.5 85,26 r90 top
TP3 "TP" TP_SMD_D1.5 87,14.5 r90 top
TP4 "TP" TP_SMD_D1.5 93,27.5 r90 top
U1_CAN_A1 "STM32F072C8T6" STM-LQFP48_M 9.05,48.9 r270 top (schematic designator U1)
U1_CAN_A2 "STM32F072C8T6" STM-LQFP48_M 35.55,48.9 r270 top (schematic designator U1)
U1_CAN_B3 "STM32F072C8T6" STM-LQFP48_M 62.05,48.9 r270 top (schematic designator U1)
U1_CAN_B4 "STM32F072C8T6" STM-LQFP48_M 88.55,48.9 r270 top (schematic designator U1)
U2_CAN_A1 "TCAN1042HVDR" FP-D0008B-IPC_B 20.5,48 r0 top (schematic designator U2)
U2_CAN_A2 "TCAN1042HVDR" FP-D0008B-IPC_B 47,48 r0 top (schematic designator U2)
U2_CAN_B3 "TCAN1042HVDR" FP-D0008B-IPC_B 73.5,48 r0 top (schematic designator U2)
U2_CAN_B4 "TCAN1042HVDR" FP-D0008B-IPC_B 100,48 r0 top (schematic designator U2)
U3 "USBLC6-2SC6" SOT95P280X145-6N 97,21.5 r0 top
U4 "SL2.1A" SO16 51,21 r180 top
U5 "AMS1117-3.3" FP-AMS1117-IPC_C 78.5,20 r180 top
U6 "LM66100DCKR" FP-DCK0006A-IPC_C 89,17.73 r90 top
U7 "LM66100DCKR" FP-DCK0006A-IPC_C 89,23 r90 top
Y1_CAN_A1 "YXC X50328MSB2GI" FP-ABM3-MFG 11.55,56.9 r180 top (schematic designator Y1)
Y1_CAN_A2 "YXC X50328MSB2GI" FP-ABM3-MFG 38.05,56.9 r180 top (schematic designator Y1)
Y1_CAN_B3 "YXC X50328MSB2GI" FP-ABM3-MFG 64.55,56.9 r180 top (schematic designator Y1)
Y1_CAN_B4 "YXC X50328MSB2GI" FP-ABM3-MFG 91.05,56.9 r180 top (schematic designator Y1)
Y2 "X322512MSB4SI" FP-ABM8-MFG 58.5,16 r270 top

## Footprints (in the part's own frame and the unit in brackets; to place one, negate y for a bottom-side part, rotate by r counter-clockwise, add the part's x,y. Pads: shape width x height; smd on the part's side, far side on the other; paste and mask are expansions set on the pad)
61202021621 [mm] "20 pins, straight, gold plating"
  rrect50% 1.6x1.6 hole 1.1: 1(-11.43,-1.27)
  round 1.6 hole 1.1: 2(-11.43,1.27) 3(-8.89,-1.27) 4(-8.89,1.27) 5(-6.35,-1.27) 6(-6.35,1.27) 7(-3.81,-1.27) 8(-3.81,1.27) 9(-1.27,-1.27) 10(-1.27,1.27) 11(1.27,-1.27) 12(1.27,1.27) 13(3.81,-1.27) 14(3.81,1.27) 15(6.35,-1.27) 16(6.35,1.27) 17(8.89,-1.27) 18(8.89,1.27) 19(11.43,-1.27) 20(11.43,1.27)
  silkscreen extent -16.63,-4.5 16.63,4.5, body extent -16.53,-4.42 16.53,4.75, height 9.13
61204021621 [mm] "40 pins, straight, gold plating"
  rrect50% 1.6x1.6 hole 1.1: 1(-24.13,-1.27)
  round 1.6 hole 1.1: 2(-24.13,1.27) 3(-21.59,-1.27) 4(-21.59,1.27) 5(-19.05,-1.27) 6(-19.05,1.27) 7(-16.51,-1.27) 8(-16.51,1.27) 9(-13.97,-1.27) 10(-13.97,1.27) 11(-11.43,-1.27) 12(-11.43,1.27) 13(-8.89,-1.27) 14(-8.89,1.27) 15(-6.35,-1.27) 16(-6.35,1.27) 17(-3.81,-1.27) 18(-3.81,1.27) 19(-1.27,-1.27) 20(-1.27,1.27) 21(1.27,-1.27) 22(1.27,1.27) 23(3.81,-1.27) 24(3.81,1.27) 25(6.35,-1.27) 26(6.35,1.27) 27(8.89,-1.27) 28(8.89,1.27) 29(11.43,-1.27) 30(11.43,1.27) 31(13.97,-1.27) 32(13.97,1.27) 33(16.51,-1.27) 34(16.51,1.27) 35(19.05,-1.27) 36(19.05,1.27) 37(21.59,-1.27) 38(21.59,1.27) 39(24.13,-1.27) 40(24.13,1.27)
  silkscreen extent -29.33,-4.5 29.33,4.5, body extent -29.23,-4.42 29.23,4.75, height 9.13
61300511121 [mm] "Pin Header, pitch 2.54 mm, THT, Vertical, single row, 5p"
  rrect50% 1.6x1.6 hole 1.1: 1(-5.08,0)
  round 1.6 hole 1.1: 2(-2.54,0) 3(0,0) 4(2.54,0) 5(5.08,0)
  silkscreen extent -7.07,-1.35 6.5,1.35, body extent -6.35,-1.27 6.35,1.27, height 8.57
AVAG-HSMX-C190_V [mm] "SMD, 2-Leads, Body 1.6x0.8mm, Height 0.9mm"
  rect 0.8x0.8 smd: 1(-0.75,0) 2(0.75,0)
  silkscreen extent 1.65,-0.4 1.65,0.4, body extent -0.8,-0.4 0.8,0.4, height 0.9
CAPC0402(1005)60_L [mm] "Chip Capacitor, Body 1.0x0.5mm, Height 0.6mm, IPC High Density"
  rrect25% 0.5x0.55 smd: 1(-0.45,0) 2(0.45,0)
  silkscreen extent 0,-0.2 0,0.2, body extent -0.5,-0.25 0.5,0.25, height 0.6
CAPC0603(1608)100_L [mm] "Chip Capacitor, Body 1.6x0.8mm, Height 1.0mm, IPC High Density"
  rrect25% 0.66x0.76 smd: 1(-0.7,0) 2(0.7,0)
  silkscreen extent 0,-0.3 0,0.3, body extent -0.8,-0.4 0.8,0.4, height 0.95
CAPC0805(2012)145_L [mm] "Chip Capacitor, Body 2.0x1.2mm, Height 1.45mm, IPC High Density"
  rrect25% 0.76x1.3 smd: 1(-0.9,0) 2(0.89,0)
  silkscreen extent -0.3,-0.55 0.3,0.55, body extent -1,-0.6 1,0.6, height 1.45
CAPC1005X55X25LL05T10 [mm] "Chip Capacitor, 2-Leads, Body 1.05x0.55mm, IPC High Density"
  rect 0.56x0.52 smd: 1(-0.39,0) 2(0.39,0)
  body extent -0.53,-0.28 0.53,0.28, height 0.55
CAPC1608X90X40NL10T20 [mm] "Chip Capacitor, 2-Leads, Body 1.70x0.90mm, IPC Medium Density"
  rect 0.95x0.95 smd: 1(-0.625,0) 2(0.625,0)
  body extent -0.85,-0.45 0.85,0.45, height 0.9
FAIR-SOT23-3_V [mm] "SOT23, 3-Leads, Body 3.12x1.5mm, Pitch 0.95mm"
  rect 1.4x1 smd: 1(-1.1,0.95) 2(-1.1,-0.95) 3(1.1,0)
  silkscreen extent -1.22,-1.55 0.75,2.13, body extent -1.35,-1.56 1.35,1.56, height 1.2
FP-ABM3-MFG [mm]
  rect 1.9x2.4 smd paste+0 mask+0: 1(-2.05,0) 2(2.05,0)
  silkscreen extent -2.6,-1.7 2.6,1.7, body extent -3.1,-1.8 3.1,1.8, height 0.25
FP-ABM8-MFG [mm]
  rect 1.3x1.05 smd paste+0 mask+0: 1(-1.15,-0.875) 2(1.15,-0.875) 3(1.15,0.875) 4(-1.15,0.875)
  silkscreen extent -2.5,-1.88 1.7,1.88, body extent -1.9,-1.5 1.9,1.5, height 0.25
FP-AMS1117-IPC_C [mm]
  rect 1.004x0.872 smd paste+0 mask+0: 1(-3.295,2.29)
  rrect100% 1.004x0.872 smd paste+0 mask+0: 2(-3.295,0) 3(-3.295,-2.29)
  rrect87% 1.004x3.182 smd paste+0 mask+0: 4(3.295,0)
  silkscreen extent -3.42,-3.25 1.75,3.62, body extent -3.9,-3.35 3.9,3.35, height 0.25
FP-D0008B-IPC_B [mm]
  rect 2.169x0.582 smd paste+0 mask+0: 1(-2.364,1.905)
  rrect100% 2.169x0.582 smd paste+0 mask+0: 2(-2.364,0.635) 3(-2.364,-0.635) 4(-2.364,-1.905) 5(2.364,-1.905) 6(2.364,-0.635) 7(2.364,0.635) 8(2.364,1.905)
  silkscreen extent -4.12,-2.45 0.78,2.45, body extent -1.95,-2.45 1.95,2.45, height 1.75
FP-DCK0006A-IPC_C [mm]
  rect 1.164x0.336 smd paste+0 mask+0: 1(-0.77,0.65)
  rrect100% 1.164x0.336 smd paste+0 mask+0: 2(-0.77,0) 3(-0.77,-0.65) 4(0.77,-0.65) 5(0.77,0) 6(0.77,0.65)
  silkscreen extent -2.05,-1.25 1.05,1.25
FP-LTST-C170GKT-MFG [mm]
  rect 1.2x1.2 smd paste+0 mask+0: 1(-1.05,0) 2(1.05,0)
  silkscreen extent -2.35,-0.67 0.08,0.67, body extent -1.75,-0.77 1.75,0.77, height 0.25
FP-S3B-PH-K-S_LF_SN-MFG [mm]
  rect 1.2x1.2 hole 0.7 paste-2539.97 mask+0: 1(2,-2.45)
  round 1.2 hole 0.7 paste-2539.97 mask+0: 2(0,-2.45) 3(-2,-2.45)
  silkscreen extent -3.95,-3.8 3.95,3.8, body extent -4.05,-3.9 4.05,3.9, height 0.25
HRO_TYPE-C-31-M-12 [mm]
  rect 0.6x1.14 smd mask+0.05: A1_B12(-3.2,4.75) A4_B9(-2.4,4.75) B1_A12(3.2,4.75) B4_A9(2.4,4.75)
  rect 0.3x1.14 smd mask+0.05: A5(-1.25,4.75) A6(-0.25,4.75) A7(0.25,4.75) A8(1.25,4.75) B5(1.75,4.75) B6(0.75,4.75) B7(-0.75,4.75) B8(-1.75,4.75)
  oval 0.9x2 hole 0.6 slot 1.7 at 90 deg: S1(-4.325,4.17) S2(4.325,4.17)
  oval 0.9x1.7 hole 0.6 slot 1.4 at 90 deg: S3(-4.325,0) S4(4.325,0)
  round 0.6 hole 0.6 unplated: ""(-2.89,3.68) ""(2.89,3.68)
  silkscreen extent -4.47,-2.6 4.47,6.1, body extent -4.47,-2.6 4.47,5.31, height 3.31
MH_M3_PTH [mm]
  round 0.6 hole 0.3: 1(-2.4,0) 1(-1.697,-1.697) 1(-1.697,1.697) 1(0,-2.4) 1(0,2.4) 1(1.697,-1.697) 1(1.697,1.697) 1(2.4,0)
  round 6 hole 3.2: 1(0,0)
RESC0402(1005)_L [mm] "Chip Resistor, Body 1.0x0.5mm, IPC High Density"
  rrect25% 0.5x0.55 smd: 1(-0.45,0) 2(0.45,0)
  silkscreen extent 0,-0.2 0,0.2, body extent -0.5,-0.25 0.5,0.25, height 0.3
RESC1608X55X25ML10T15 [mm] "Chip Resistor, 2-Leads, Body 1.70x0.90mm, IPC Low Density"
  rect 0.8x1 smd: 1(-0.75,0) 2(0.75,0)
  body extent -0.85,-0.45 0.85,0.45, height 0.55
RESC3116X70X50ML13T20 [mm] "Chip Resistor, 2-Leads, Body 3.25x1.65mm, IPC Low Density"
  rect 1.4x1.75 smd: 1(-1.5,0) 2(1.5,0)
  silkscreen extent -0.4,-0.77 0.4,0.77, body extent -1.63,-0.82 1.63,0.82, height 0.7
SO16 [mil]
  rect 26x80 smd: 1(-175,-121) 2(-125,-121) 3(-75,-121) 4(-25,-121) 5(25,-121) 6(75,-121) 7(125,-121) 8(175,-121) 9(175,121) 10(125,121) 11(75,121) 12(25,121) 13(-25,121) 14(-75,121) 15(-125,121) 16(-175,121)
  silkscreen extent -200,-77 200,77, body extent -195,-119 195,119, height 73
SOT95P280X145-6N [mm] "SOT23, 6-Leads, Body 2.93x2.80mm, Pitch 0.95mm, IPC Medium Density"
  oval 1.3x0.6 smd: 1(-1.2,0.95) 2(-1.2,0) 3(-1.2,-0.95) 4(1.2,-0.95) 5(1.2,0) 6(1.2,0.95)
  silkscreen extent -1.79,-1.59 0.94,1.76, body extent -1.5,-1.53 1.5,1.53, height 1.45
STM-LQFP48_M [mm] "QFP, 48-Leads, Body 7x7mm, Pitch 0.5mm, IPC Low Density"
  oval 1.65x0.3 smd: 1(-4.325,2.75) 2(-4.325,2.25) 3(-4.325,1.75) 4(-4.325,1.25) 5(-4.325,0.75) 6(-4.325,0.25) 7(-4.325,-0.25) 8(-4.325,-0.75) 9(-4.325,-1.25) 10(-4.325,-1.75) 11(-4.325,-2.25) 12(-4.325,-2.75) 25(4.325,-2.75) 26(4.325,-2.25) 27(4.325,-1.75) 28(4.325,-1.25) 29(4.325,-0.75) 30(4.325,-0.25) 31(4.325,0.25) 32(4.325,0.75) 33(4.325,1.25) 34(4.325,1.75) 35(4.325,2.25) 36(4.325,2.75)
  oval 0.3x1.65 smd: 13(-2.75,-4.325) 14(-2.25,-4.325) 15(-1.75,-4.325) 16(-1.25,-4.325) 17(-0.75,-4.325) 18(-0.25,-4.325) 19(0.25,-4.325) 20(0.75,-4.325) 21(1.25,-4.325) 22(1.75,-4.325) 23(2.25,-4.325) 24(2.75,-4.325) 37(2.75,4.325) 38(2.25,4.325) 39(1.75,4.325) 40(1.25,4.325) 41(0.75,4.325) 42(0.25,4.325) 43(-0.25,4.325) 44(-0.75,4.325) 45(-1.25,4.325) 46(-1.75,4.325) 47(-2.25,4.325) 48(-2.75,4.325)
  silkscreen extent -4.45,-3.1 3.1,3.58, body extent -3.5,-3.5 3.5,3.5, height 1.6
SW_KMR221GLFS [mm]
  rect 0.9x1 smd: 1(-2.05,0.8) 2(-2.05,-0.8) 3(2.05,-0.8) 4(2.05,0.8)
  rect 1.7x0.55 smd: 5(0,1.425)
  silkscreen extent -1.2,-1.4 1.2,-1.4, body extent -2.3,-1.4 2.3,1.4, height 0.5
TP_SMD_D1.5 [mil]
  round 60 smd paste-99999: 1(0,0)

## Part data
C1_CAN_A1 C1_CAN_A2 C1_CAN_B3 C1_CAN_B4 C5_CAN_A1 C5_CAN_A2 C5_CAN_B3 C5_CAN_B4 C9 C13_CAN_A1 C13_CAN_A2 C13_CAN_B3 C13_CAN_B4 C18 C19: library part CMP-001-00076-4, "0603", LCSC=C19666, Max Operating Temperature=85°C, Min Operating Temperature=-55°C, Tolerance=10%, Voltage Rating=10V, Case/Package=0603, Mounting Technology=SMT, Pins=2
C2_CAN_A1 C2_CAN_A2 C2_CAN_B3 C2_CAN_B4 C4_CAN_A1 C4_CAN_A2 C4_CAN_B3 C4_CAN_B4 C6_CAN_A1 C6_CAN_A2 C6_CAN_B3 C6_CAN_B4 C10_CAN_A1 C10_CAN_A2 C10_CAN_B3 C10_CAN_B4 C14_CAN_A1 C14_CAN_A2 C14_CAN_B3 C14_CAN_B4 C15_CAN_A1 C15_CAN_A2 C15_CAN_B3 C15_CAN_B4: library part CMP-001-00017-6, "0603", Capacitor Type=Ceramic, LCSC=C14663, Max Operating Temperature=125°C, Min Operating Temperature=-55°C, Tolerance=10%, Voltage Rating=50V, Case/Package=0603, Mounting Technology=SM, Pins=2, RoHS Compliant=True
C3_CAN_A1 C3_CAN_A2 C3_CAN_B3 C3_CAN_B4: library part CMP-001-00017-6, "0603", Capacitor Type=Ceramic, LCSC=C53987, Max Operating Temperature=125°C, Min Operating Temperature=-55°C, Tolerance=10%, Voltage Rating=50V, Case/Package=0603, Mounting Technology=SM, Pins=2, RoHS Compliant=True
C7_CAN_A1 C7_CAN_A2 C7_CAN_B3 C7_CAN_B4: library part CMP-001-00073-3, "Chip Capacitor, 33 pF +/-10%, 50V, 0402, Thickness 0.6 mm", Case/Package=0402, LCSC=C1562, Max Operating Temperature=85°C, Min Operating Temperature=-55°C, Tolerance=10%, Voltage Rating=50V, Mounting Technology=SMT, Pins=2
C8_CAN_A1 C8_CAN_A2 C8_CAN_B3 C8_CAN_B4: library part CMP-001-00073-3, "0402", LCSC=C1562, Max Operating Temperature=85°C, Min Operating Temperature=-55°C, Tolerance=10%, Voltage Rating=50V, Case/Package=0402, Mounting Technology=SMT, Pins=2
C11_CAN_A1 C11_CAN_A2 C11_CAN_B3 C11_CAN_B4: library part CMP-001-00017-6, "0603", Capacitor Type=Ceramic, LCSC=C57112, Max Operating Temperature=125°C, Min Operating Temperature=-55°C, Tolerance=10%, Voltage Rating=50V, Case/Package=0603, Mounting Technology=SM, Pins=2, RoHS Compliant=True
C12_CAN_A1 C12_CAN_A2 C12_CAN_B3 C12_CAN_B4: library part CMP-001-00017-6, "0603", Capacitor Type=Ceramic, LCSC=C15849, Max Operating Temperature=125°C, Min Operating Temperature=-55°C, Tolerance=10%, Voltage Rating=50V, Case/Package=0603, Mounting Technology=SM, Pins=2, RoHS Compliant=True
C16 C17: library part CMP-001-00076-4, "0603", LCSC=C14663, Max Operating Temperature=85°C, Min Operating Temperature=-55°C, Tolerance=10%, Voltage Rating=10V, Case/Package=0603, Mounting Technology=SMT, Pins=2
C20 C22: library part CMP-001-00075-4, "0603", LCSC=C19702, Max Operating Temperature=85°C, Min Operating Temperature=-55°C, Tolerance=10%, Voltage Rating=10V, Case/Package=0603, Mounting Technology=SMT, Pins=2
C21: library part CMP-001-00081-4, "0805", LCSC=C45783, Max Operating Temperature=85°C, Min Operating Temperature=-55°C, Tolerance=5%, Voltage Rating=16V, Case/Package=0805, Mounting Technology=SMT, Pins=2
C23: library part CMP-001-00075-4, "0603", LCSC=C14663, Max Operating Temperature=85°C, Min Operating Temperature=-55°C, Tolerance=10%, Voltage Rating=10V, Case/Package=0603, Mounting Technology=SMT, Pins=2
C24 C25: library part CMP-001-00008-6, "0402", Capacitor Type=Ceramic, LCSC=C52923, Max Operating Temperature=85°C, Min Operating Temperature=-55°C, Tolerance=10%, Voltage Rating=6.3V, Case/Package=0402, Mounting Technology=SM, Pins=2, RoHS Compliant=True
D1_CAN_A1 D1_CAN_A2 D1_CAN_B3 D1_CAN_B4: library part CMP-004-00013-2, Case/Package=SOT-23, LCSC=C15771, Package Reference=SOT23-3, Pins=3
D2_CAN_A1 D2_CAN_A2 D2_CAN_B3 D2_CAN_B4: library part CMP-1674-00002-6, "LED GREEN CLEAR SMD", Case Code (Imperial)=0805, Case Code (Metric)=2012, Color=Green, Forward Current=30mA, Forward Voltage=2.1V, LCSC=C2297, Lens Color=Colorless, Max Operating Temperature=85°C, Min Operating Temperature=-55°C, Package Quantity=1, Power Dissipation=100mW, Reverse Voltage=5V, Test Current=10mA, Case/Package=0805, Depth=1.25mm, Dominant Wavelength=569nm, Height=1.1mm, Illumination Color=Green, Lead Free="Lead Free", Length=2mm, Lens Style=Diffused, Lens Transparency=Clear, Luminous Intensity=6mcd, Mount="Surface Mount", Number of Elements=1, Number of LEDs=1, Number of Pins=2, Packaging="Tape and Reel", Power Rating=100mW, Radiation Hardening=No, Viewing Angle=130°, Voltage=5V, Wavelength=565nm, Width=1.25mm
D3_CAN_A1 D3_CAN_A2 D3_CAN_B3 D3_CAN_B4: library part CMP-1674-00002-6, "LED YELLOW CLEAR SMD", Case Code (Imperial)=0805, Case Code (Metric)=2012, Color=Green, Forward Current=30mA, Forward Voltage=2.1V, LCSC=C2296, Lens Color=Colorless, Max Operating Temperature=85°C, Min Operating Temperature=-55°C, Package Quantity=1, Power Dissipation=100mW, Reverse Voltage=5V, Test Current=10mA, Case/Package=0805, Depth=1.25mm, Dominant Wavelength=569nm, Height=1.1mm, Illumination Color=Green, Lead Free="Lead Free", Length=2mm, Lens Style=Diffused, Lens Transparency=Clear, Luminous Intensity=6mcd, Mount="Surface Mount", Number of Elements=1, Number of LEDs=1, Number of Pins=2, Packaging="Tape and Reel", Power Rating=100mW, Radiation Hardening=No, Viewing Angle=130°, Voltage=5V, Wavelength=565nm, Width=1.25mm
DS1: library part CMP-007-00014-2, Case/Package=0603, Colour=Red, Forward Current=20mA, Forward Voltage=1.8V, LCSC=C2286, Manufacturer=Avago, Max Operating Temperature=85°C, Min Operating Temperature=-40°C, Package Description="2-Pin Surface Mount Device, Body 1.6 x 0.8 mm, Height 0.9 mm", Package Quantity=4000, Package Reference=HSMX-C190, Power=78mW, Datasheet URL=http://docs.avagotech.com/docs/AV02-0551EN, Datasheet Version=Mar-12, Illumination Colour=Red, Lens Style=Diffused, Luminous Intensity=17mcd, Manufacturer URL=http://www.avagotech.com/, Mounting Technology=SM, Nominal Vf=1.8V, Packaging=TapeandReel, Pins=2, RoHS Compliant=True, Viewing Angle=170degrees
H1 H2 H3 H4: library part MH_M3_PTH
J1_CAN_A1 J1_CAN_A2 J1_CAN_B3 J1_CAN_B4: library part CMP-17439-000039-1, "CONN HEADER R/A 3POS 2MM", Height=0.31inch, Length=0.31inch, Weight=0.0625lb, Width=0.31inch
J2: "USB Connectors 24 Receptacle 1 8.94*7.3mm RoHS", Package=Package, Check_prices=https://www.snapeda.com/parts/TYPE-C-31-M-12/HRO+Electronics+Co.%252C+Ltd./view-part/?ref=eda, MF="HRO Electronics Co., Ltd.", MP=TYPE-C-31-M-12, SnapEDA_Link=https://www.snapeda.com/parts/TYPE-C-31-M-12/HRO+Electronics+Co.%252C+Ltd./view-part/?ref=snap
P1_CAN_A1 P1_CAN_A2 P1_CAN_B3 P1_CAN_B4: library part CMP-1502-01068-4, "THT Vertical Pin Header WR-PHD, Pitch 2.54 mm, Single Row, 5 pins", Color=Black, Contact Resistance=20mΩ, Current Rating=3A, Max Operating Temperature=105°C, Min Operating Temperature=-40°C, Operating Supply Voltage=250V, Connector Type="Male Pin", Contact Material=Gold, Contact Mating Length=5.9944mm, Contact Plating=Gold, Gender=Male, Height=8.89mm, Lead Free="Lead Free", Lead Pitch=2.54mm, Mount="Through Hole", Number of Contacts=5, Number of Pins=5, Number of Positions=5, Number of Rows=1, Orientation=Vertical, Packaging=Bulk, Pitch=2.54mm, RoHS=Compliant, Termination=Solder, Voltage Rating=250V
P2: library part CMP-1502-00015-4, "WR-BHD Straight Male, Box Header, Through Hole, 2 Rows, 40 Contacts, 2.54mm Pitch", Color=Black, Contact Resistance=20mΩ, Current Rating=3A, Insulation Resistance=1GΩ, Max Operating Temperature=105°C, Min Operating Temperature=-40°C, Operating Supply Voltage=250V, Connector Type="Male Pin", Contact Material=Gold, Contact Plating=Gold, Gender=Male, Height=9.25mm, Insulation Material=PBT, Lead Pitch=2.54mm, Length=58.46mm, Mount="Through Hole", Number of Contacts=40, Number of Pins=40, Number of Positions=40, Number of Rows=2, Orientation=Vertical, Pitch=2.54mm, REACH SVHC=Unknown, RoHS=Compliant, Row Spacing=2.54mm, Termination=Solder, Voltage Rating=250V
P3: library part CMP-1502-00010-3, "WR-BHD Straight Male, Box Header, Through Hole, 2 Rows, 20 Contacts, 2.54mm Pitch", Color=Black, Contact Resistance=20mΩ, Current Rating=3A, Flammability Rating="UL94 V-0", Insulation Resistance=1GΩ, Max Operating Temperature=105°C, Min Operating Temperature=-40°C, Operating Supply Voltage=250V, Connector Type="Male Pin", Contact Gender=Male, Contact Material=Gold, Contact Plating=Gold, Gender=Male, Height=9.25mm, Housing Material=PBT, Insulation=Insulated, Insulation Material=PBT, Lead Pitch=2.54mm, Length=33.06mm, Mount="Through Hole", Number of Contacts=20, Number of Pins=20, Number of Positions=20, Number of Rows=2, Orientation=Vertical, Pitch=2.54mm, RoHS=Compliant, Row Spacing=2.54mm, Termination="Through Hole", Voltage Rating=250V, Voltage Rating (DC)=250V, Width=33.06mm
R1_CAN_A1 R1_CAN_A2 R1_CAN_B3 R1_CAN_B4: library part CMP-009-00114-3, Case/Package=0402, LCSC=C25076, Power=63mW, Tolerance=5%, Mounting Technology=SMT, Pins=2
R2_CAN_A1 R2_CAN_A2 R2_CAN_B3 R2_CAN_B4: library part CMP-009-00114-3, Case/Package=0402, LCSC=C11702, Power=63mW, Tolerance=5%, Mounting Technology=SMT, Pins=2
R3_CAN_A1 R3_CAN_A2 R3_CAN_B3 R3_CAN_B4: library part CMP-009-00031-5, Case/Package=0603, LCSC=C25803, Max Operating Temperature=155°C, Min Operating Temperature=-55°C, Power=100mW, Tolerance=1%, Mounting Technology=SM, Pins=2, RoHS Compliant=True
R4_CAN_A1 R4_CAN_A2 R4_CAN_B3 R4_CAN_B4 R17 R18: library part CMP-009-00031-5, Case/Package=0603, LCSC=C23140, Max Operating Temperature=155°C, Min Operating Temperature=-55°C, Power=100mW, Tolerance=1%, Mounting Technology=SM, Pins=2, RoHS Compliant=True
R5_CAN_A1 R5_CAN_A2 R5_CAN_B3 R5_CAN_B4 R10_CAN_A1 R10_CAN_A2 R10_CAN_B3 R10_CAN_B4: library part CMP-009-00031-5, Case/Package=0603, LCSC=C25804, Max Operating Temperature=155°C, Min Operating Temperature=-55°C, Power=100mW, Tolerance=1%, Mounting Technology=SM, Pins=2, RoHS Compliant=True
R6_CAN_A1 R6_CAN_A2 R6_CAN_B3 R6_CAN_B4 R7_CAN_A1 R7_CAN_A2 R7_CAN_B3 R7_CAN_B4 R15_CAN_A1 R15_CAN_A2 R15_CAN_B3 R15_CAN_B4 R16_CAN_A1 R16_CAN_A2 R16_CAN_B3 R16_CAN_B4: library part CMP-009-00011-5, "1206", LCSC=C17909, Max Operating Temperature=155°C, Min Operating Temperature=-55°C, Power=250mW, Tolerance=1%, Voltage Rating=200V, Case/Package=1206, Mounting Technology=SM, Pins=2, RoHS Compliant=True
R8: library part CMP-009-00031-5, "0603", LCSC=C23164, Max Operating Temperature=155°C, Min Operating Temperature=-55°C, Power=100mW, Tolerance=1%, Case/Package=0603, Mounting Technology=SM, Pins=2, RoHS Compliant=True
R9 R14: library part CMP-009-00168-3, "Chip Resistor, 100 kOhms, +/-1 %, 63 mW, -55 to 155 degC, 0402", Case/Package=0402, LCSC=C25741, Max Operating Temperature=155°C, Min Operating Temperature=-55°C, Power=63mW, Tolerance=1%, Pins=2
R11 R12: library part CMP-009-00031-5, "0603", LCSC=C23186, Max Operating Temperature=155°C, Min Operating Temperature=-55°C, Power=100mW, Tolerance=1%, Case/Package=0603, Mounting Technology=SM, Pins=2, RoHS Compliant=True
R13: library part CMP-009-00031-5, "0603", LCSC=C21190, Max Operating Temperature=155°C, Min Operating Temperature=-55°C, Power=100mW, Tolerance=1%, Case/Package=0603, Mounting Technology=SM, Pins=2, RoHS Compliant=True
S1_CAN_A1 S1_CAN_A2 S1_CAN_B3 S1_CAN_B4 S2_CAN_A1 S2_CAN_A2 S2_CAN_B3 S2_CAN_B4: "Switch Tactile N.O. SPST Button Gull Wing 0.05A 32VDC 1VA 200000Cycles 2N SMD Automotive T/R", LCSC=C72443, Package=None, Check_prices=https://www.snapeda.com/parts/KMR221G%20LFS/C%2526K/view-part/?ref=eda, MF=CK, MP="KMR221G LFS", SnapEDA_Link=https://www.snapeda.com/parts/KMR221G%20LFS/C%2526K/view-part/?ref=snap
TP1 TP2 TP3 TP4: library part TP_SMD_D1.5
U1_CAN_A1 U1_CAN_A2 U1_CAN_B3 U1_CAN_B4: library part CMP-0304-00166-4, "ARM Cortex-M0 32-bit MCU, 64 KB Flash, 16 KB Internal RAM, 37 I/Os, 48-Pin LQFP, -40 to 85 degC, Tray", I/Os (High Current)=37, LCSC=C80488, Manufacturer=STMicroelectronics, Operating Frequency(F) (Processor speed) (MHz)=48, Package Description="48-Pin Low Profile Quad Flat Package, Body 7 x 7 mm, Pitch 0.5 mm", Package Reference=LQFP48, Supply Voltage(Vcc) min (V)=2, ComponentLink1Description="Manufacturer URL", ComponentLink1URL=http://www.st.com/, ComponentLink2Description=Datasheet, ComponentLink2URL=http://www.st.com/st-web-ui/static/active/en/resource/technical/document/datasheet/DM00090510.pdf, Core="ARM Cortex-M0", D/A Converter=1, DatasheetVersion="Rev. 5", FLASH Size (Prog) (kB)=64, Internal RAM Size (kB)=16, Mounting Technology="Surface Mount", Packing=Tray, PartNumber=STM32F072C8T6
U2_CAN_A1 U2_CAN_A2 U2_CAN_B3 U2_CAN_B4: library part CMP-04872-000069-1, "IC TRANSCEIVER 1/1 8SOIC", Case/Package=SOIC, LCSC=C127869, Max Operating Temperature=125°C, Max Supply Voltage=5.5V, Min Operating Temperature=-55°C, Min Supply Voltage=4.5V, Data Rate=2Mbps, Lead Free="Lead Free", Mount="Surface Mount", Number of Pins=8, Number of Receive Buffers=1, Number of Transmit Buffers=1, Packaging="Cut Tape", REACH SVHC="No SVHC", Receiver Hysteresis=120mV, RoHS Compliant=Yes
U3: "17V Clamp 5A (8/20Âµs) Ipp Tvs Diode Surface Mount SOT-23-6", LCSC=C7519, Package="SOT-23-6 STMicroelectronics", Availability="In Stock", Check_prices=https://www.snapeda.com/parts/USBLC6-2SC6/STMicroelectronics/view-part/?ref=eda, MF=STMicroelectronics, MP=USBLC6-2SC6, Price=None, Purchase-URL=https://pricing.snapeda.com/search/part/USBLC6-2SC6/?ref=eda, SnapEDA_Link=https://www.snapeda.com/parts/USBLC6-2SC6/STMicroelectronics/view-part/?ref=snap
U4: "USB 2.0 HIGH SPEED 4-PORT HUB CONTROLLER", LCSC=C6798314, Package=Package, Check_prices=https://www.snapeda.com/parts/SL2.1A/CoreChips+ShenZhen+CO.%252CLtd/view-part/?ref=eda, MF="CoreChips ShenZhen CO.,Ltd", MP=SL2.1A, SnapEDA_Link=https://www.snapeda.com/parts/SL2.1A/CoreChips+ShenZhen+CO.%252CLtd/view-part/?ref=snap
U5: library part CMP-209535-000001-1, "LDO Voltage Regulators 1A, 3.3V", Dropout Voltage=1.1V, LCSC=C6186, Manufacturer="Advanced Monolithic Systems", Max Junction Temp=+125°C, Max Power Dissipation=1.2W, Max Supply Voltage=15V, Nominal Supply Current=5mA, Output Current=1A, Output Voltage=3.3V, Package=AMS1117, Temperature="-40°C to +125°C", Temperature Range Low=-40°C, Automotive=No, Category=IC, ComponentLink2Description=Datasheet, ComponentLink2URL=http://www.advanced-monolithic.com/pdf/ds1117.pdf, Device Class L1="Integrated Circuits (ICs)", Device Class L2="Power Management ICs", Device Class L3="Voltage Regulators - Linear", Height=1.8mm, Ipc Land Pattern Name=SOT229P700X180-4, Lead Free=Yes, Manufacturer Part Number=AMS1117-3.3, Number Of Outputs=1, Octopart=https://octopart.com/ams1117-3.3-advanced+monolithic+systems-25899300, Output Type=Fixed, RoHS=TRUE, Standoff Height=0.64mm, Temperature Range High=+125°C
U6 U7: library part CMP-04910-000059-1, "IC OR CTRLR IDEAL DIODE SC70-6", LCSC=C2869734
Y1_CAN_A1 Y1_CAN_A2 Y1_CAN_B3 Y1_CAN_B4: library part CMP-2000-05033-2, Case/Package=CSMD, ESR (Equivalent Series Resistance)=140R, Frequency=8MHz, Frequency Stability=30ppm, Frequency Tolerance=20ppm, LCSC=C115962, Load Capacitance=18pF, Max Operating Temperature=85°C, Min Operating Temperature=-40°C, Package Quantity=1000, Resistor Type=Ceramic, Series Resistance=500R, Depth=3.2mm, Height=0.051inch, Lead Free="Lead Free", Length=5mm, Mount="Surface Mount", Number of Pins=2, Packaging="Tape and Reel", Radiation Hardening=No, RoHS Compliant=Yes, Termination=SMD/SMT, Tolerance=20ppm, Width=3.2mm
Y2: library part CMP-27762-003220-1, Case/Package=CSMD, ESR (Equivalent Series Resistance)=120R, Frequency=12MHz, Frequency Stability=50ppm, Frequency Tolerance=20ppm, LCSC=C9002, Load Capacitance=18pF, Max Operating Temperature=70°C, Min Operating Temperature=-20°C, Operating Frequency="12 MHz", Package Quantity=1000, Resistor Type=Ceramic, Depth=2.5mm, Height=0.031inch, Lead Free="Lead Free", Length=3.2mm, Mount="Surface Mount", Number of Pins=4, Packaging="Tape and Reel", Radiation Hardening=No, REACH SVHC="No SVHC", RoHS Compliant=Yes, Series=ABM8, Series Resistance=120R, Termination=SMD/SMT, Tolerance=20ppm, Width=0.098inch

## Via types
v1: diameter 0.6, hole 0.3, Top Layer to Bottom Layer, tented both sides, 308 vias

## Nets (pads, with @x,y where several pads share a name; then routed paths per layer and width w, separated by ;. In a path a pad name is that pad's centre, name@x,y a point inside that pad or via, vN(x,y) a via of type N, cw(c..) or ccw(c..) an arc to the next point about the centre after c; other vN are vias at no path point)
3V3: C5_CAN_A1.1 C5_CAN_A2.1 C5_CAN_B3.1 C5_CAN_B4.1 C6_CAN_A1.1 C6_CAN_A2.1 C6_CAN_B3.1 C6_CAN_B4.1 C10_CAN_A1.1 C10_CAN_A2.1 C10_CAN_B3.1 C10_CAN_B4.1 C11_CAN_A1.1 C11_CAN_A2.1 C11_CAN_B3.1 C11_CAN_B4.1 C12_CAN_A1.1 C12_CAN_A2.1 C12_CAN_B3.1 C12_CAN_B4.1 C13_CAN_A1.1 C13_CAN_A2.1 C13_CAN_B3.1 C13_CAN_B4.1 C14_CAN_A1.1 C14_CAN_A2.1 C14_CAN_B3.1 C14_CAN_B4.1 C15_CAN_A1.1 C15_CAN_A2.1 C15_CAN_B3.1 C15_CAN_B4.1 C21.2 P1_CAN_A1.1 P1_CAN_A2.1 P1_CAN_B3.1 P1_CAN_B4.1 R3_CAN_A1.2 R3_CAN_A2.2 R3_CAN_B3.2 R3_CAN_B4.2 S1_CAN_A1.2 S1_CAN_A1.3 S1_CAN_A2.2 S1_CAN_A2.3 S1_CAN_B3.2 S1_CAN_B3.3 S1_CAN_B4.2 S1_CAN_B4.3 TP1.1 U1_CAN_A1.1 U1_CAN_A1.9 U1_CAN_A1.24 U1_CAN_A1.36 U1_CAN_A1.48 U1_CAN_A2.1 U1_CAN_A2.9 U1_CAN_A2.24 U1_CAN_A2.36 U1_CAN_A2.48 U1_CAN_B3.1 U1_CAN_B3.9 U1_CAN_B3.24 U1_CAN_B3.36 U1_CAN_B3.48 U1_CAN_B4.1 U1_CAN_B4.9 U1_CAN_B4.24 U1_CAN_B4.36 U1_CAN_B4.48 U2_CAN_A1.5 U2_CAN_A2.5 U2_CAN_B3.5 U2_CAN_B4.5 U5.2 U5.4 | length 176.7
  Top Layer w0.2: v1(2,51) 1.923,50.923 1.923,50.736 1.87,50.683 1.87,48.015 2.254,47.63 2.254,47.23 2.485,47 C13_CAN_A1.1@2.5,47 C14_CAN_A1.1@2.5,45.625 3.525,45.625 4.05,46.15 U1_CAN_A1.24@4.725,46.15 ; v1(2.5,54) C12_CAN_A1.1@2.5,55.5 C11_CAN_A1.1@4.5,55.5 5.575,54.425 7.575,54.425 7.747,54.253 7.753,54.253 7.781,54.224 7.781,53.244 U1_CAN_A1.9@7.8,53.225 ; v1(28.5,51) 28.423,50.923 28.423,50.736 28.37,50.683 28.37,48.015 28.754,47.63 28.754,47.23 28.985,47 C13_CAN_A2.1@29,47 C14_CAN_A2.1@29,45.625 30.025,45.625 30.55,46.15 U1_CAN_A2.24@31.225,46.15 ; v1(29,54) C12_CAN_A2.1@29,55.5 C11_CAN_A2.1@31,55.5 32.075,54.425 34.075,54.425 34.247,54.253 34.253,54.253 34.281,54.224 34.281,53.244 U1_CAN_A2.9@34.3,53.225 ; v1(55,51) 54.923,50.923 54.923,50.736 54.87,50.683 54.87,48.015 55.254,47.63 55.254,47.23 55.485,47 C13_CAN_B3.1@55.5,47 C14_CAN_B3.1@55.5,45.625 56.525,45.625 57.05,46.15 U1_CAN_B3.24@57.725,46.15 ; v1(55.5,54) C12_CAN_B3.1@55.5,55.5 C11_CAN_B3.1@57.5,55.5 58.575,54.425 60.575,54.425 60.747,54.253 60.753,54.253 60.781,54.224 60.781,53.244 U1_CAN_B3.9@60.8,53.225 ; v1(81.5,51) 81.423,50.923 81.423,50.736 81.37,50.683 81.37,48.015 81.754,47.63 81.754,47.23 81.985,47 C13_CAN_B4.1@82,47 C14_CAN_B4.1@82,45.625 83.025,45.625 83.55,46.15 U1_CAN_B4.24@84.225,46.15 ; v1(82,54) C12_CAN_B4.1@82,55.5 C11_CAN_B4.1@84,55.5 85.075,54.425 87.075,54.425 87.247,54.253 87.253,54.253 87.281,54.224 87.281,53.244 U1_CAN_B4.9@87.3,53.225
  Top Layer w0.3: v1(4,40.5) 4.025,40.525 4.025,41.875 R3_CAN_A1.2@4.05,41.9 ; v1(10,50.5) 10.5,50.5 11.8,51.8 U1_CAN_A1.1@11.8,53.225 ; U1_CAN_A1.36@11.8,44.575 11.8,43.9 12.35,43.35 12.35,42.725 C10_CAN_A1.1@12.675,42.4 12.625,42.35 C5_CAN_A1.1@12.625,40.9 12.625,40.85 12.805,40.67 12.855,40.67 13.475,40.05 14.15,40.05 S1_CAN_A1.2@14.45,39.75 ; U1_CAN_A1.48@13.375,51.65 15.425,51.65 C15_CAN_A1.1@15.55,51.775 16.475,51.775 17,51.25 v1(17.5,51.25) ; v1(16.5,40.5) 15.25,40.5 14.8,40.05 14.75,40.05 S1_CAN_A1.2@14.45,39.75 ; S1_CAN_A1.3@18.85,40.05 18.55,39.75 S1_CAN_A1.3@18.55,39.7 S1_CAN_A1.2@14.45,39.7 S1_CAN_A1.2@14.45,39.75 ; U2_CAN_A1.5@22.864,46.095 24.905,46.095 C6_CAN_A1.1@25.5,45.5 26.693,46.693 26.943,46.693 v1(27,46.75) ; v1(30.5,40.5) 30.525,40.525 30.525,41.875 R3_CAN_A2.2@30.55,41.9 ; v1(36.5,50.5) 37,50.5 38.3,51.8 U1_CAN_A2.1@38.3,53.225 ; U1_CAN_A2.36@38.3,44.575 38.3,43.9 38.85,43.35 38.85,42.725 C10_CAN_A2.1@39.175,42.4 39.125,42.35 C5_CAN_A2.1@39.125,40.9 39.125,40.85 39.305,40.67 39.355,40.67 39.975,40.05 40.65,40.05 S1_CAN_A2.2@40.95,39.75 ; U1_CAN_A2.48@39.875,51.65 41.925,51.65 C15_CAN_A2.1@42.05,51.775 42.975,51.775 43.5,51.25 v1(44,51.25) ; v1(43,40.5) 41.75,40.5 41.3,40.05 41.25,40.05 S1_CAN_A2.2@40.95,39.75 ; S1_CAN_A2.3@45.35,40.05 45.05,39.75 S1_CAN_A2.3@45.05,39.7 S1_CAN_A2.2@40.95,39.7 S1_CAN_A2.2@40.95,39.75 ; U2_CAN_A2.5@49.364,46.095 51.405,46.095 C6_CAN_A2.1@52,45.5 52.943,46.443 53.443,46.443 v1(53.5,46.5) ; R3_CAN_B3.2@57.05,41.9 57.025,41.875 57.025,40.975 v1(57.5,40.5) ; v1(63,50.5) 63.5,50.5 64.8,51.8 U1_CAN_B3.1@64.8,53.225 ; U1_CAN_B3.36@64.8,44.575 64.8,43.9 65.35,43.35 65.35,42.725 C10_CAN_B3.1@65.675,42.4 65.625,42.35 C5_CAN_B3.1@65.625,40.9 65.625,40.85 65.805,40.67 65.855,40.67 66.475,40.05 67.15,40.05 S1_CAN_B3.2@67.45,39.75 ; U1_CAN_B3.48@66.375,51.65 68.425,51.65 C15_CAN_B3.1@68.55,51.775 68.875,51.45 70.3,51.45 v1(70.5,51.25) ; v1(69.5,40.5) 68.25,40.5 67.8,40.05 67.75,40.05 S1_CAN_B3.2@67.45,39.75 ; S1_CAN_B3.3@71.85,40.05 71.55,39.75 S1_CAN_B3.3@71.55,39.7 S1_CAN_B3.2@67.45,39.7 S1_CAN_B3.2@67.45,39.75 ; U2_CAN_B3.5@75.864,46.095 77.905,46.095 C6_CAN_B3.1@78.5,45.5 79.25,46.25 v1(80,46.25) ; v1(83.5,40.5) 83.525,40.525 83.525,41.875 R3_CAN_B4.2@83.55,41.9 ; v1(89.5,50.5) 90,50.5 91.3,51.8 U1_CAN_B4.1@91.3,53.225 ; U1_CAN_B4.36@91.3,44.575 91.3,43.9 91.85,43.35 91.85,42.725 C10_CAN_B4.1@92.175,42.4 92.125,42.35 C5_CAN_B4.1@92.125,40.9 92.125,40.85 92.305,40.67 92.355,40.67 92.975,40.05 93.65,40.05 S1_CAN_B4.2@93.95,39.75 ; U1_CAN_B4.48@92.875,51.65 94.925,51.65 C15_CAN_B4.1@95.05,51.775 95.975,51.775 96.5,51.25 v1(97,51.25) ; v1(96,40.5) 94.75,40.5 94.3,40.05 94.25,40.05 S1_CAN_B4.2@93.95,39.75 ; S1_CAN_B4.3@98.35,40.05 98.05,39.75 S1_CAN_B4.3@98.05,39.7 S1_CAN_B4.2@93.95,39.7 S1_CAN_B4.2@93.95,39.75 ; U2_CAN_B4.5@102.364,46.095 104.405,46.095 C6_CAN_B4.1@105,45.5 105.75,46.25 v1(106.25,46.25)
  other v1: 76,18.5 77.5,20 80,20 71,21.5 73,21.5 76,21.5
3V3_Jetson: P2.1 P2.17 P3.1 | length 65.8
  PWR w1: P2.17@40.84,7.04 40.84,9.34 42.75,11.25 61.16,11.25 ; P2.1@61.16,7.04 61.16,11.25 ; v1(68.5,12.5) 67.25,11.25 61.16,11.25 ; v1(73,11.5) 93,11.5 95.12,9.38 P3.1@95.12,7